# Altium PCB Thunderscope_Rev5.3.PcbDoc (part 1 of 14)
Units mil, origin at the board's own origin, x right, y up, seen from the top; angles counter-clockwise.
Board outline 3937.01 x 3838.58 mil, 6 copper layers (F.Cu, In1.Cu (GND), In2.Cu (Sign), In3.Cu (Sign), In4.Cu (GND), B.Cu), stack 60.556 mil thick; 911 components, 486 nets, 2834 pads, 2761 vias.
Unrouted connection lines stored in the file: 618.
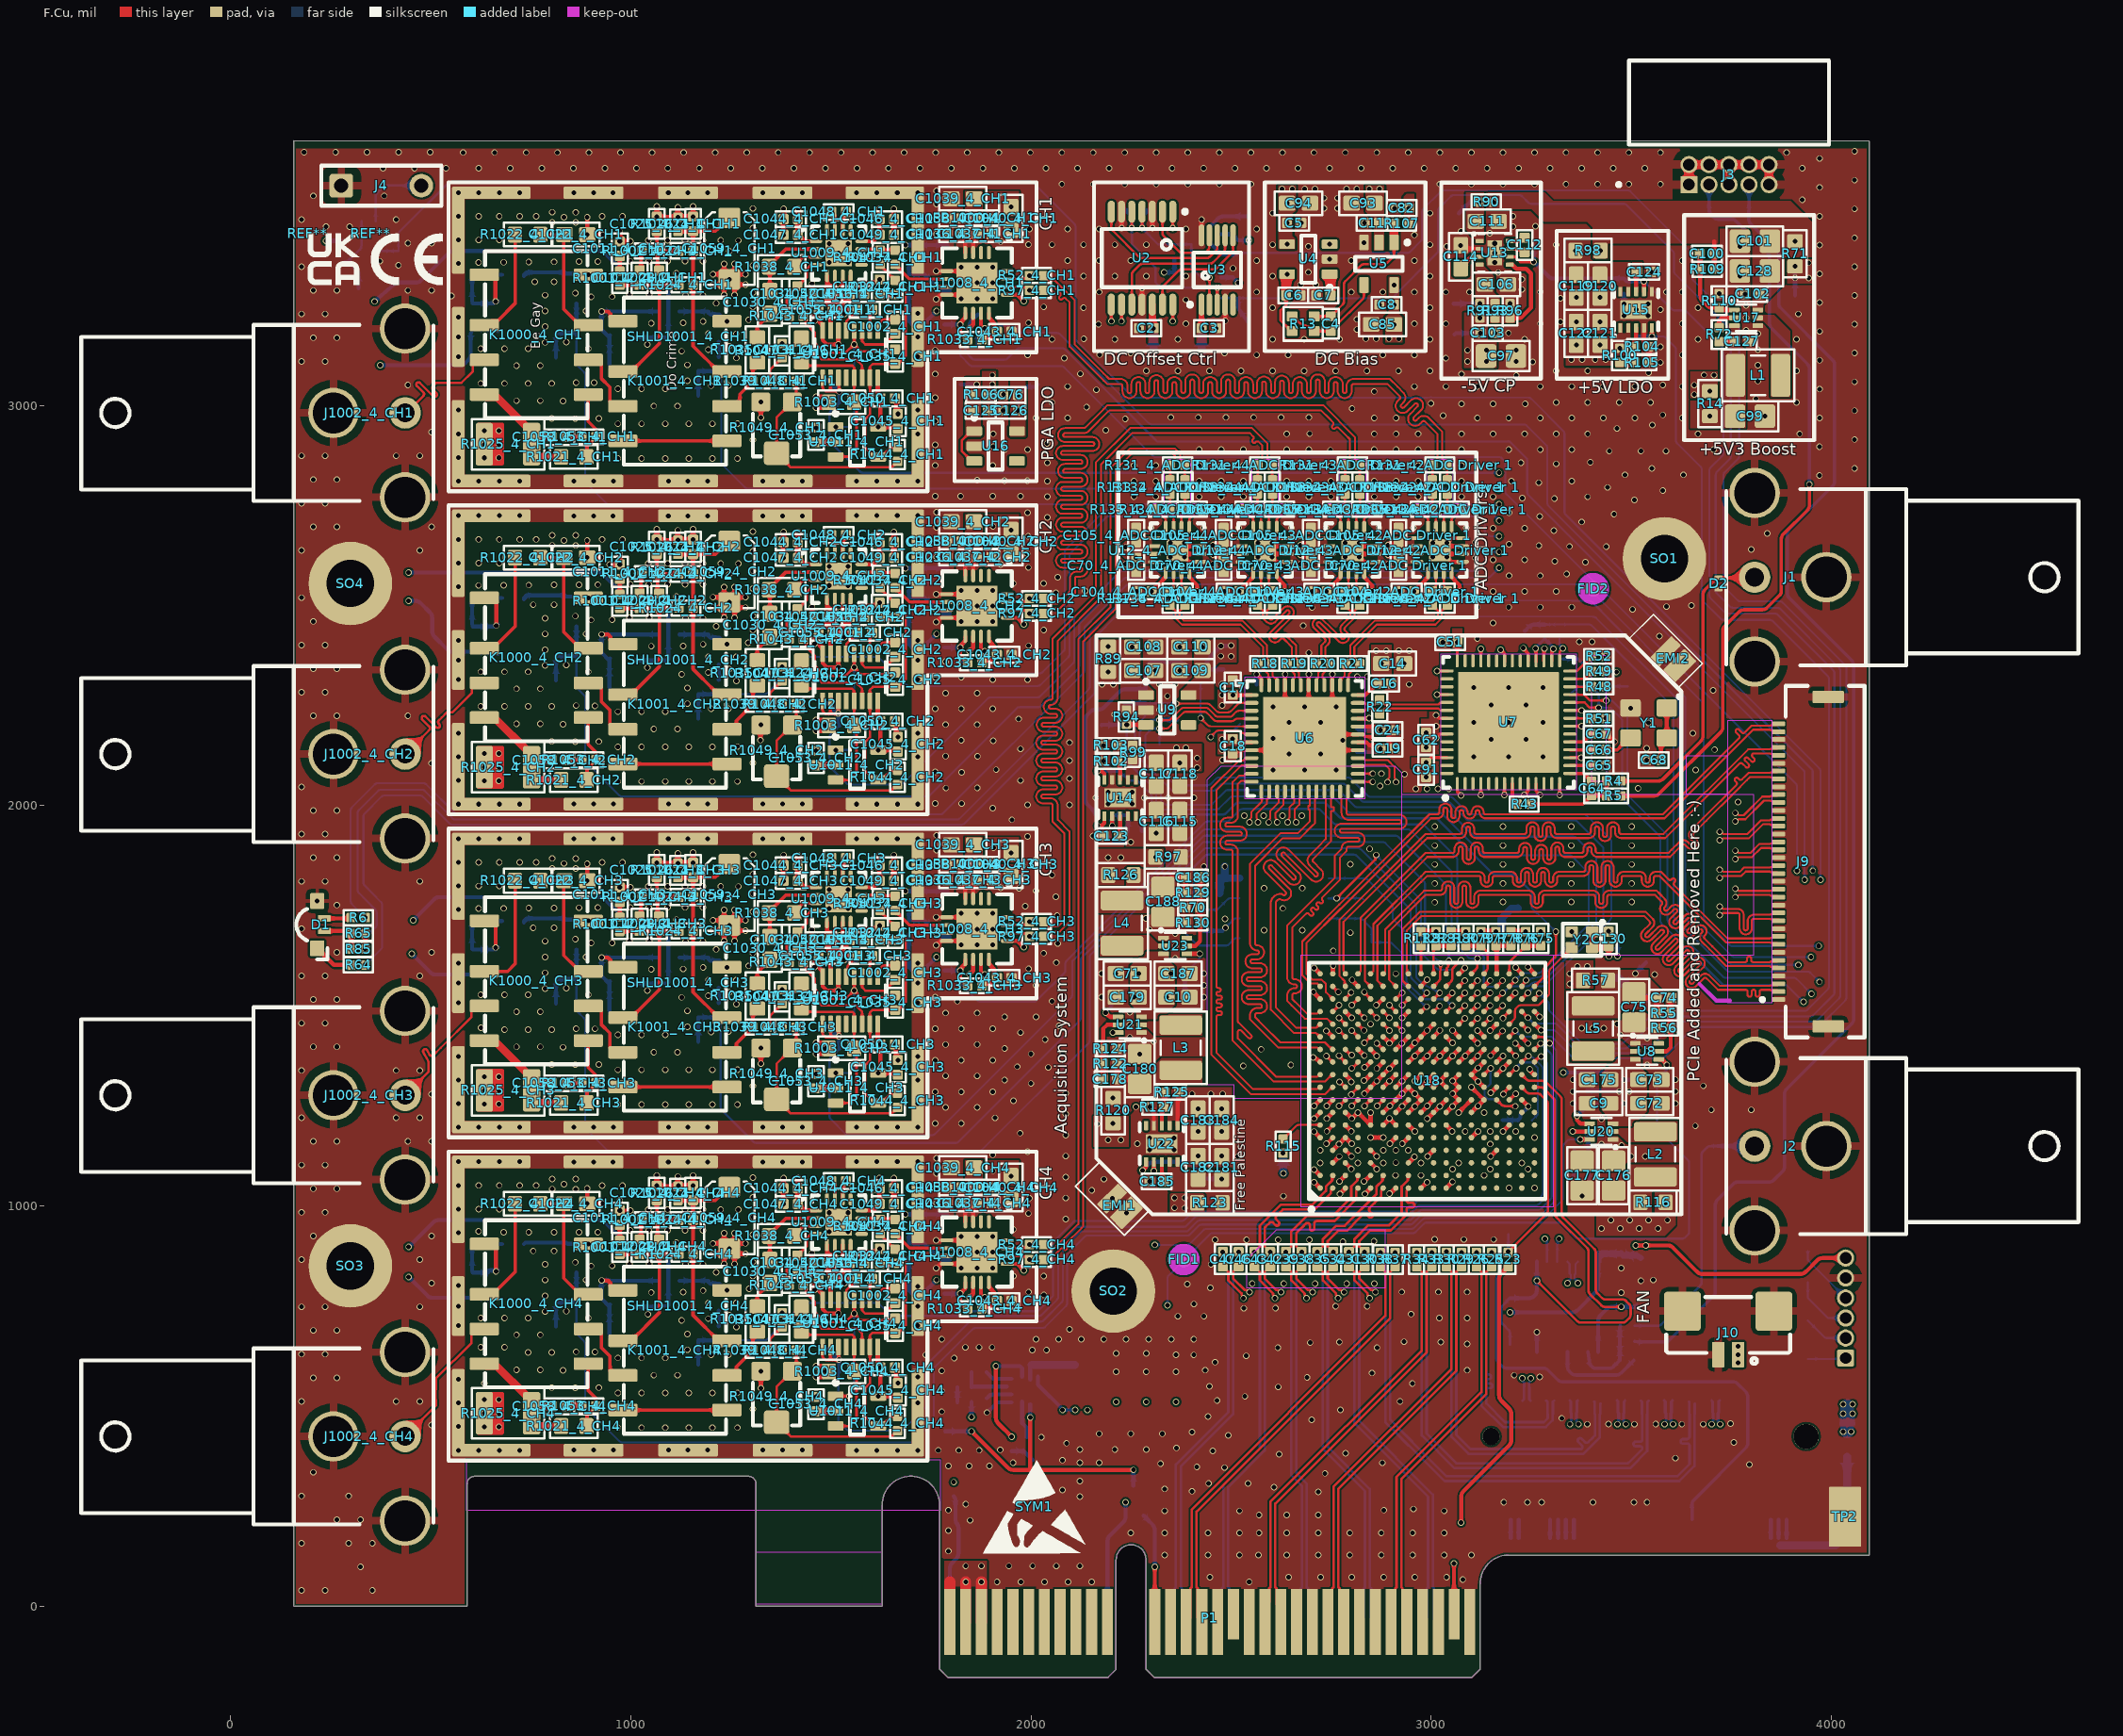
[diagram p0: F.Cu view]
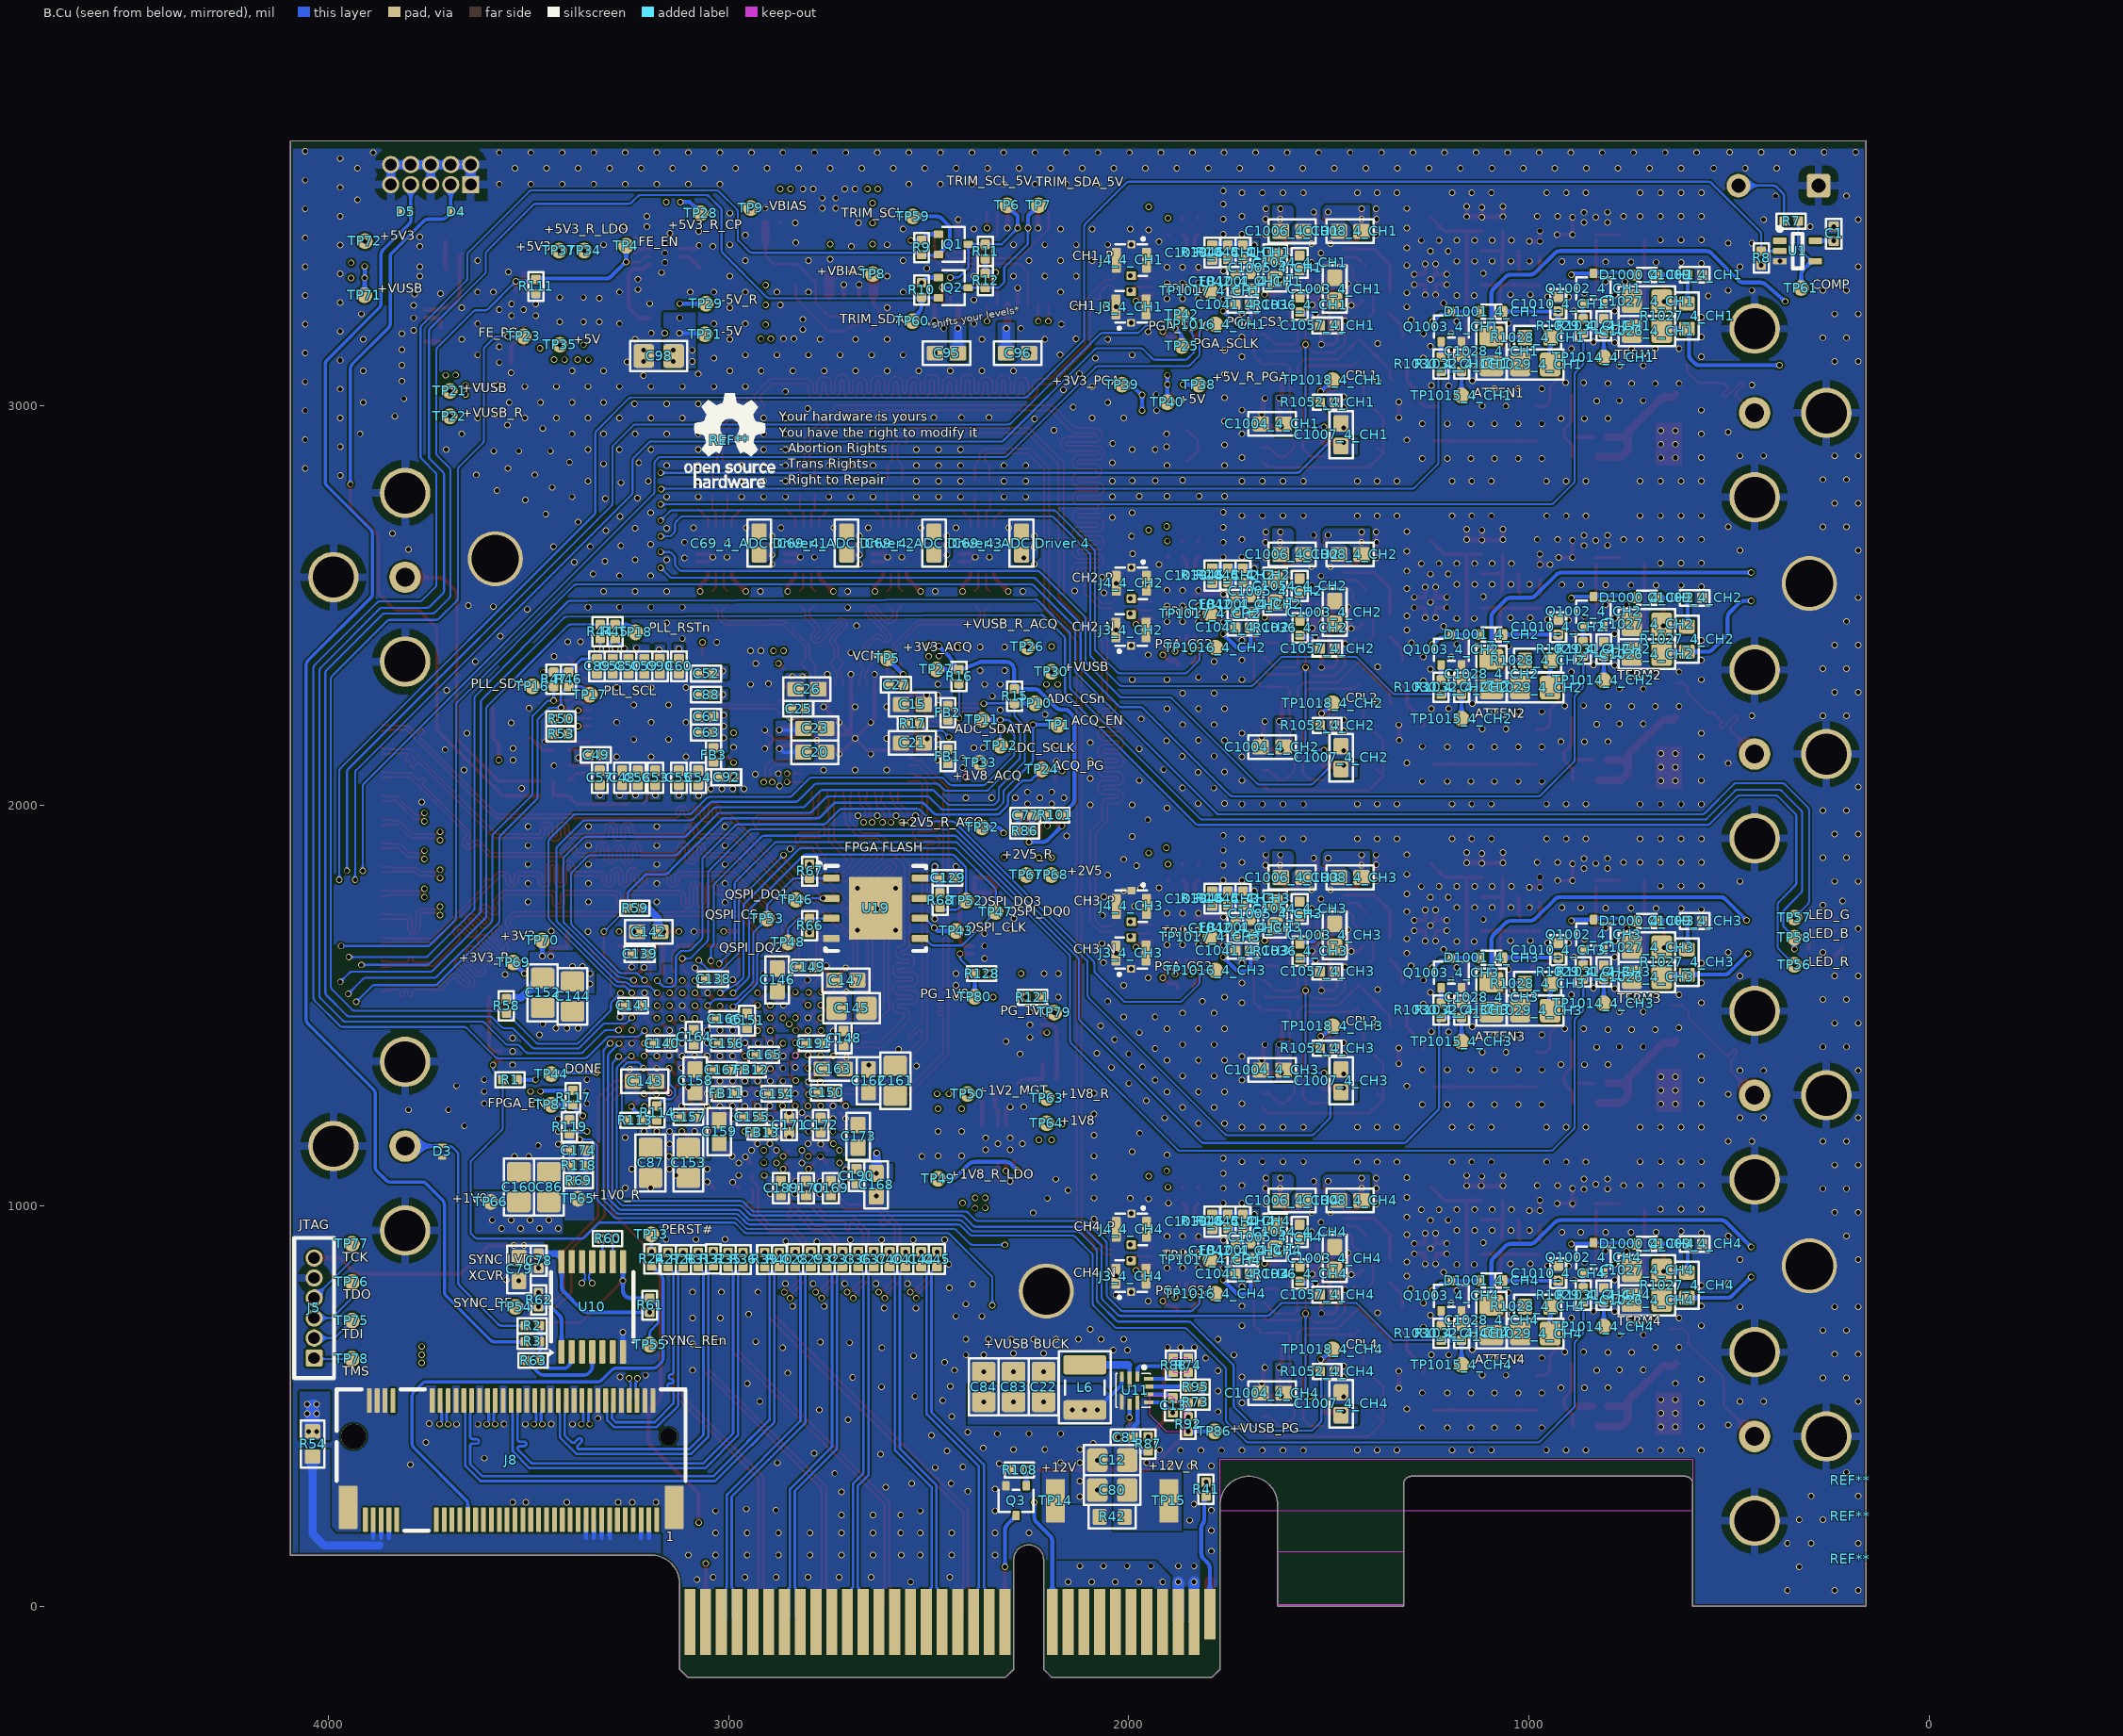
[diagram p1: B.Cu view, seen from below]
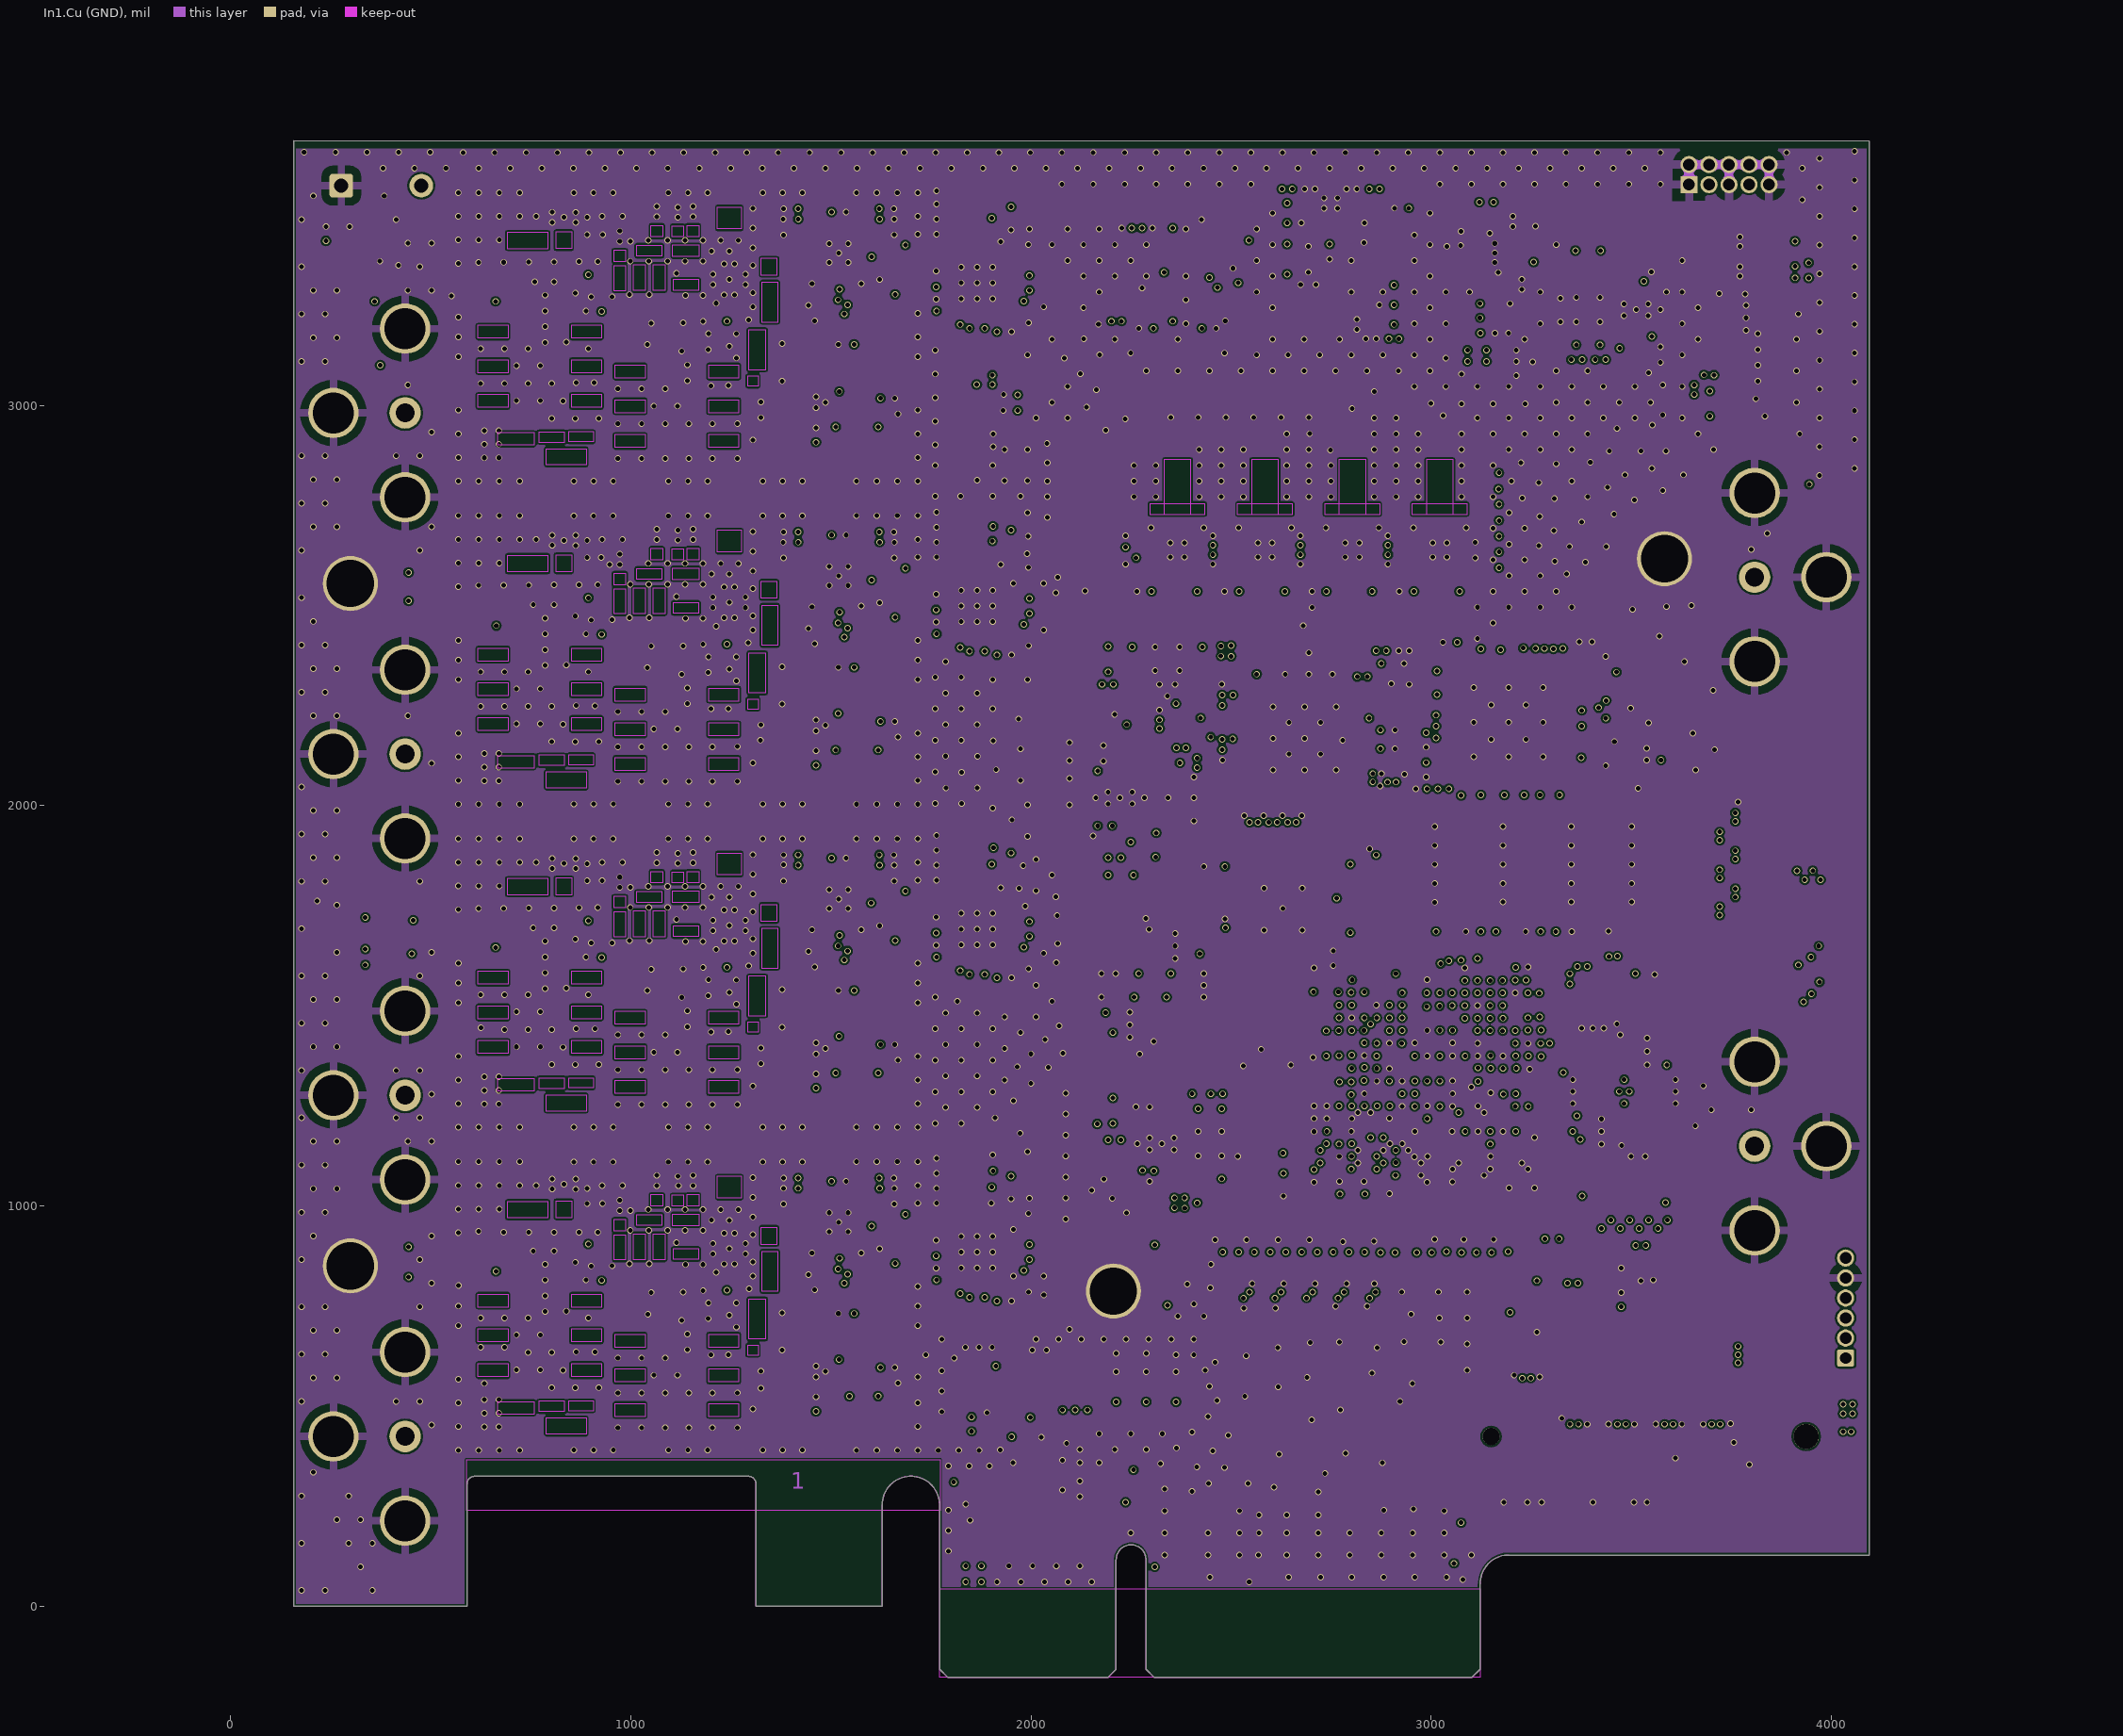
[diagram p2: In1.Cu (GND)]
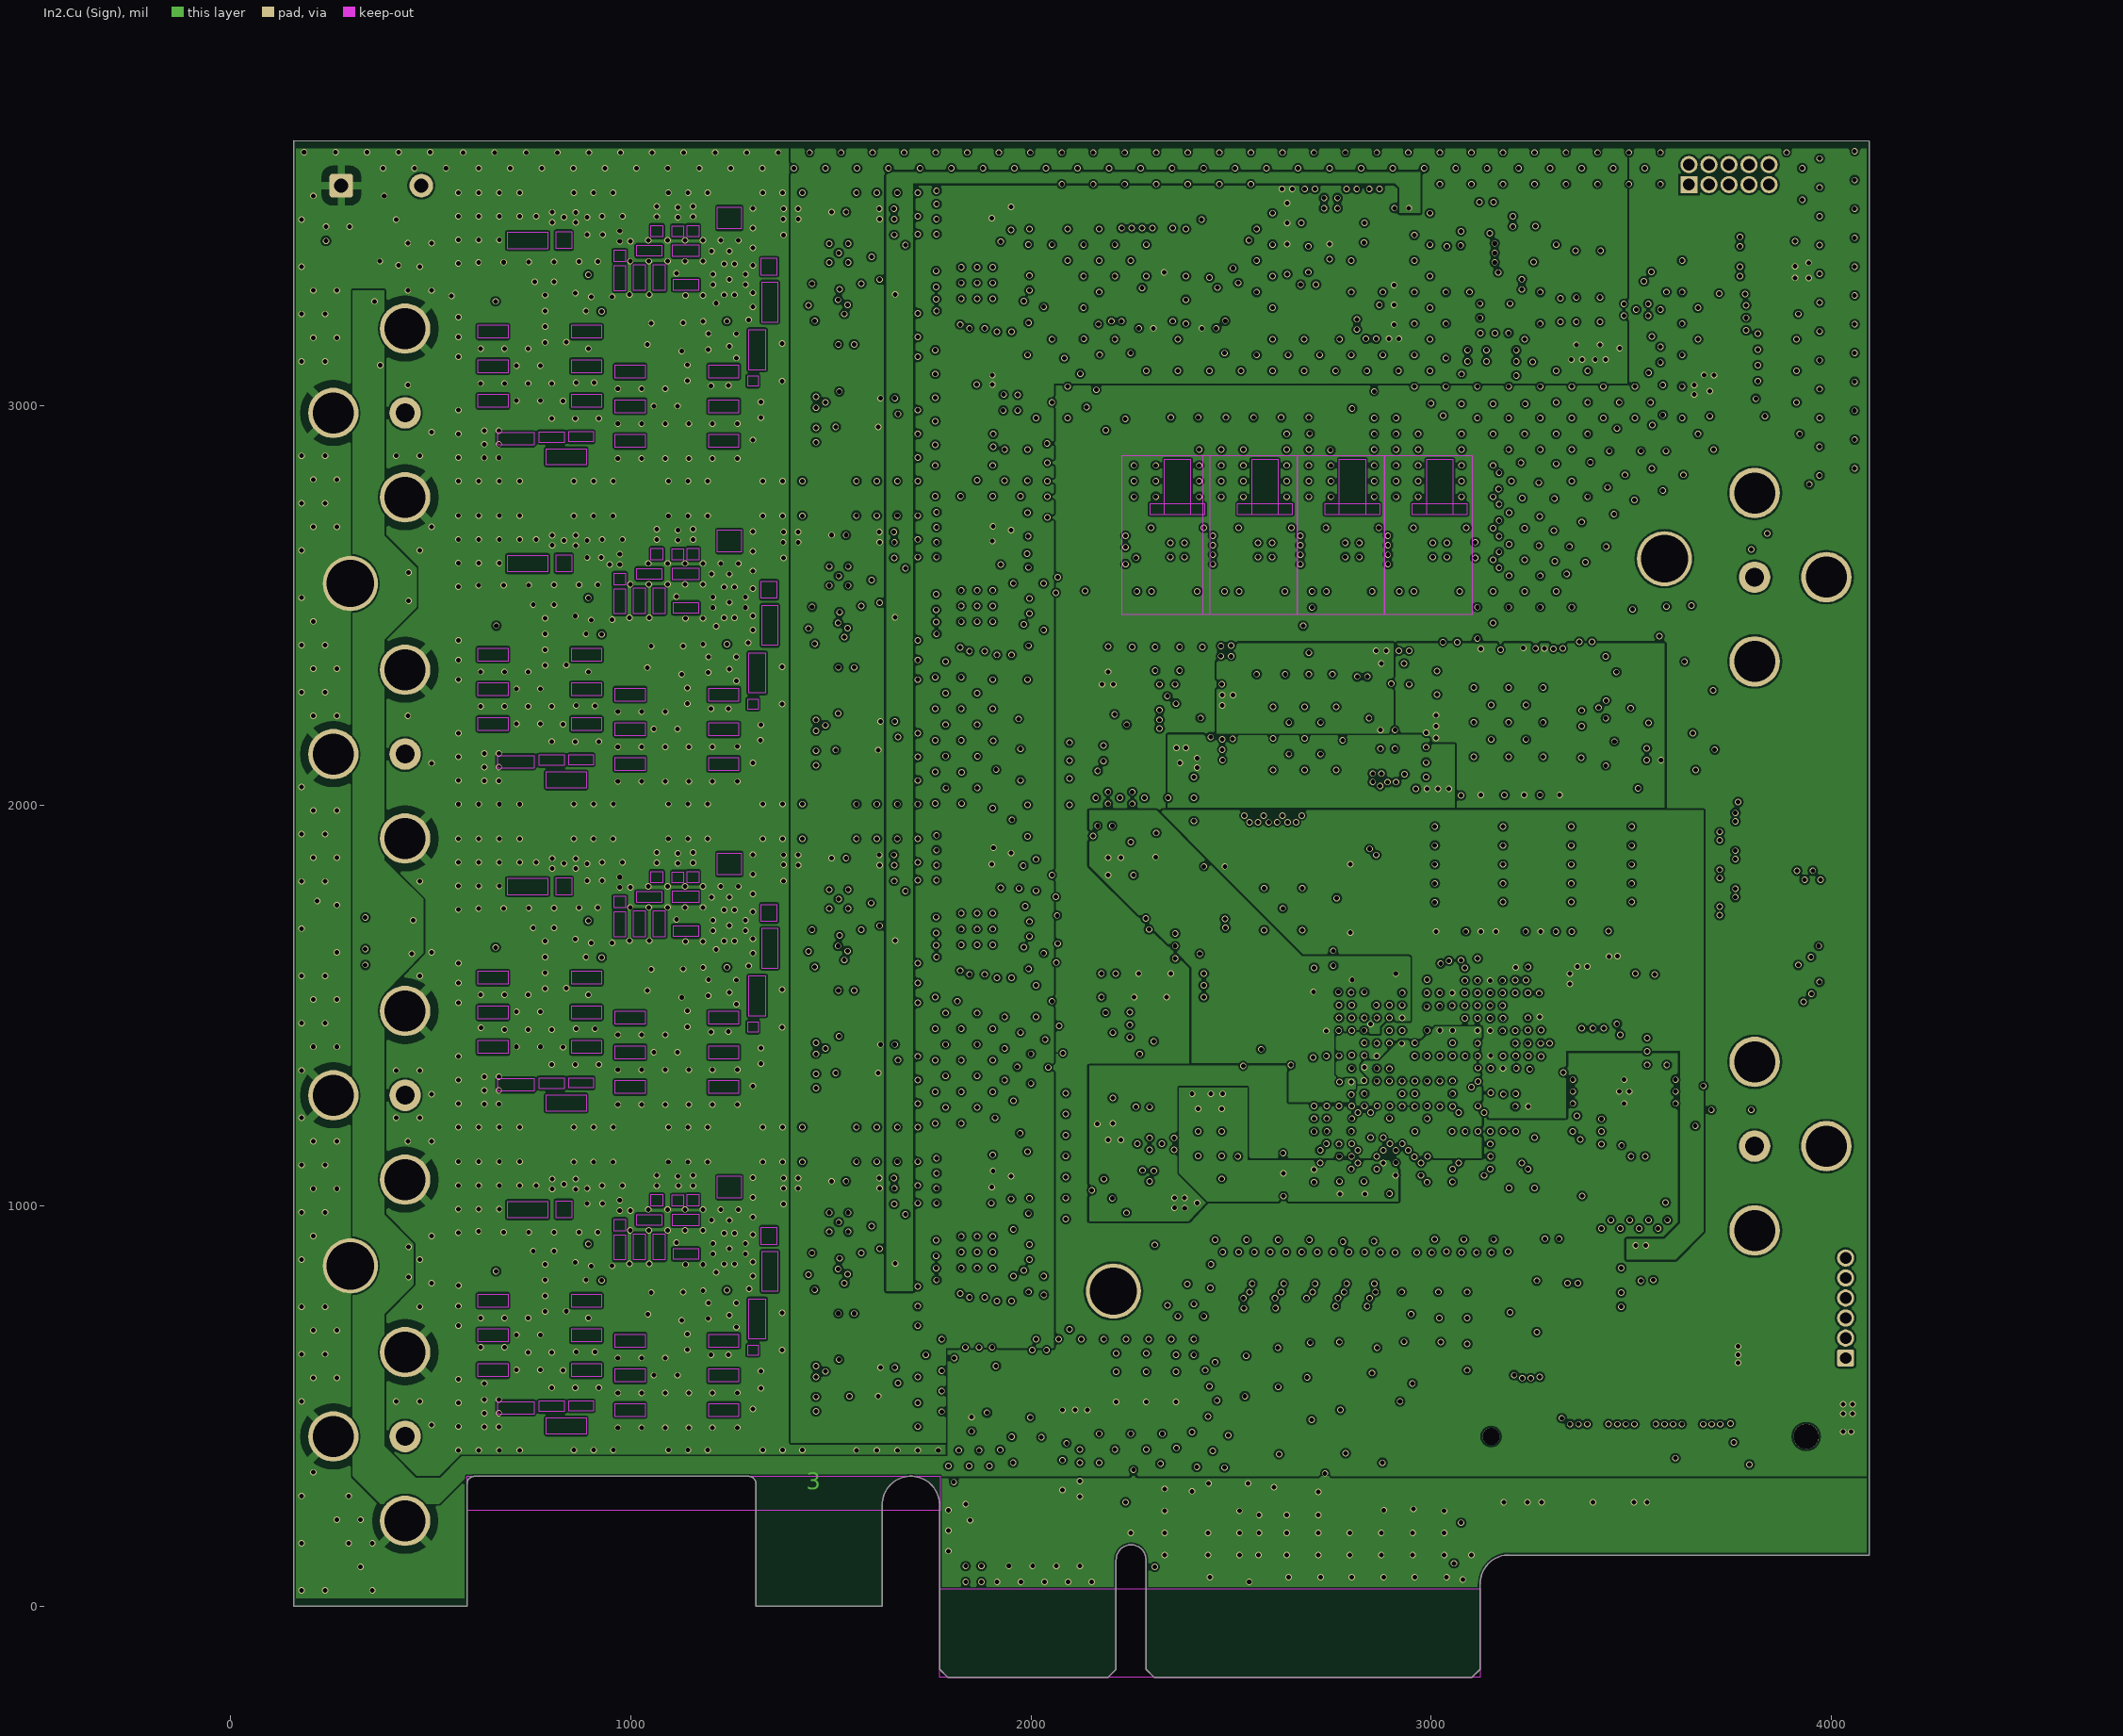
[diagram p3: In2.Cu (Sign)]
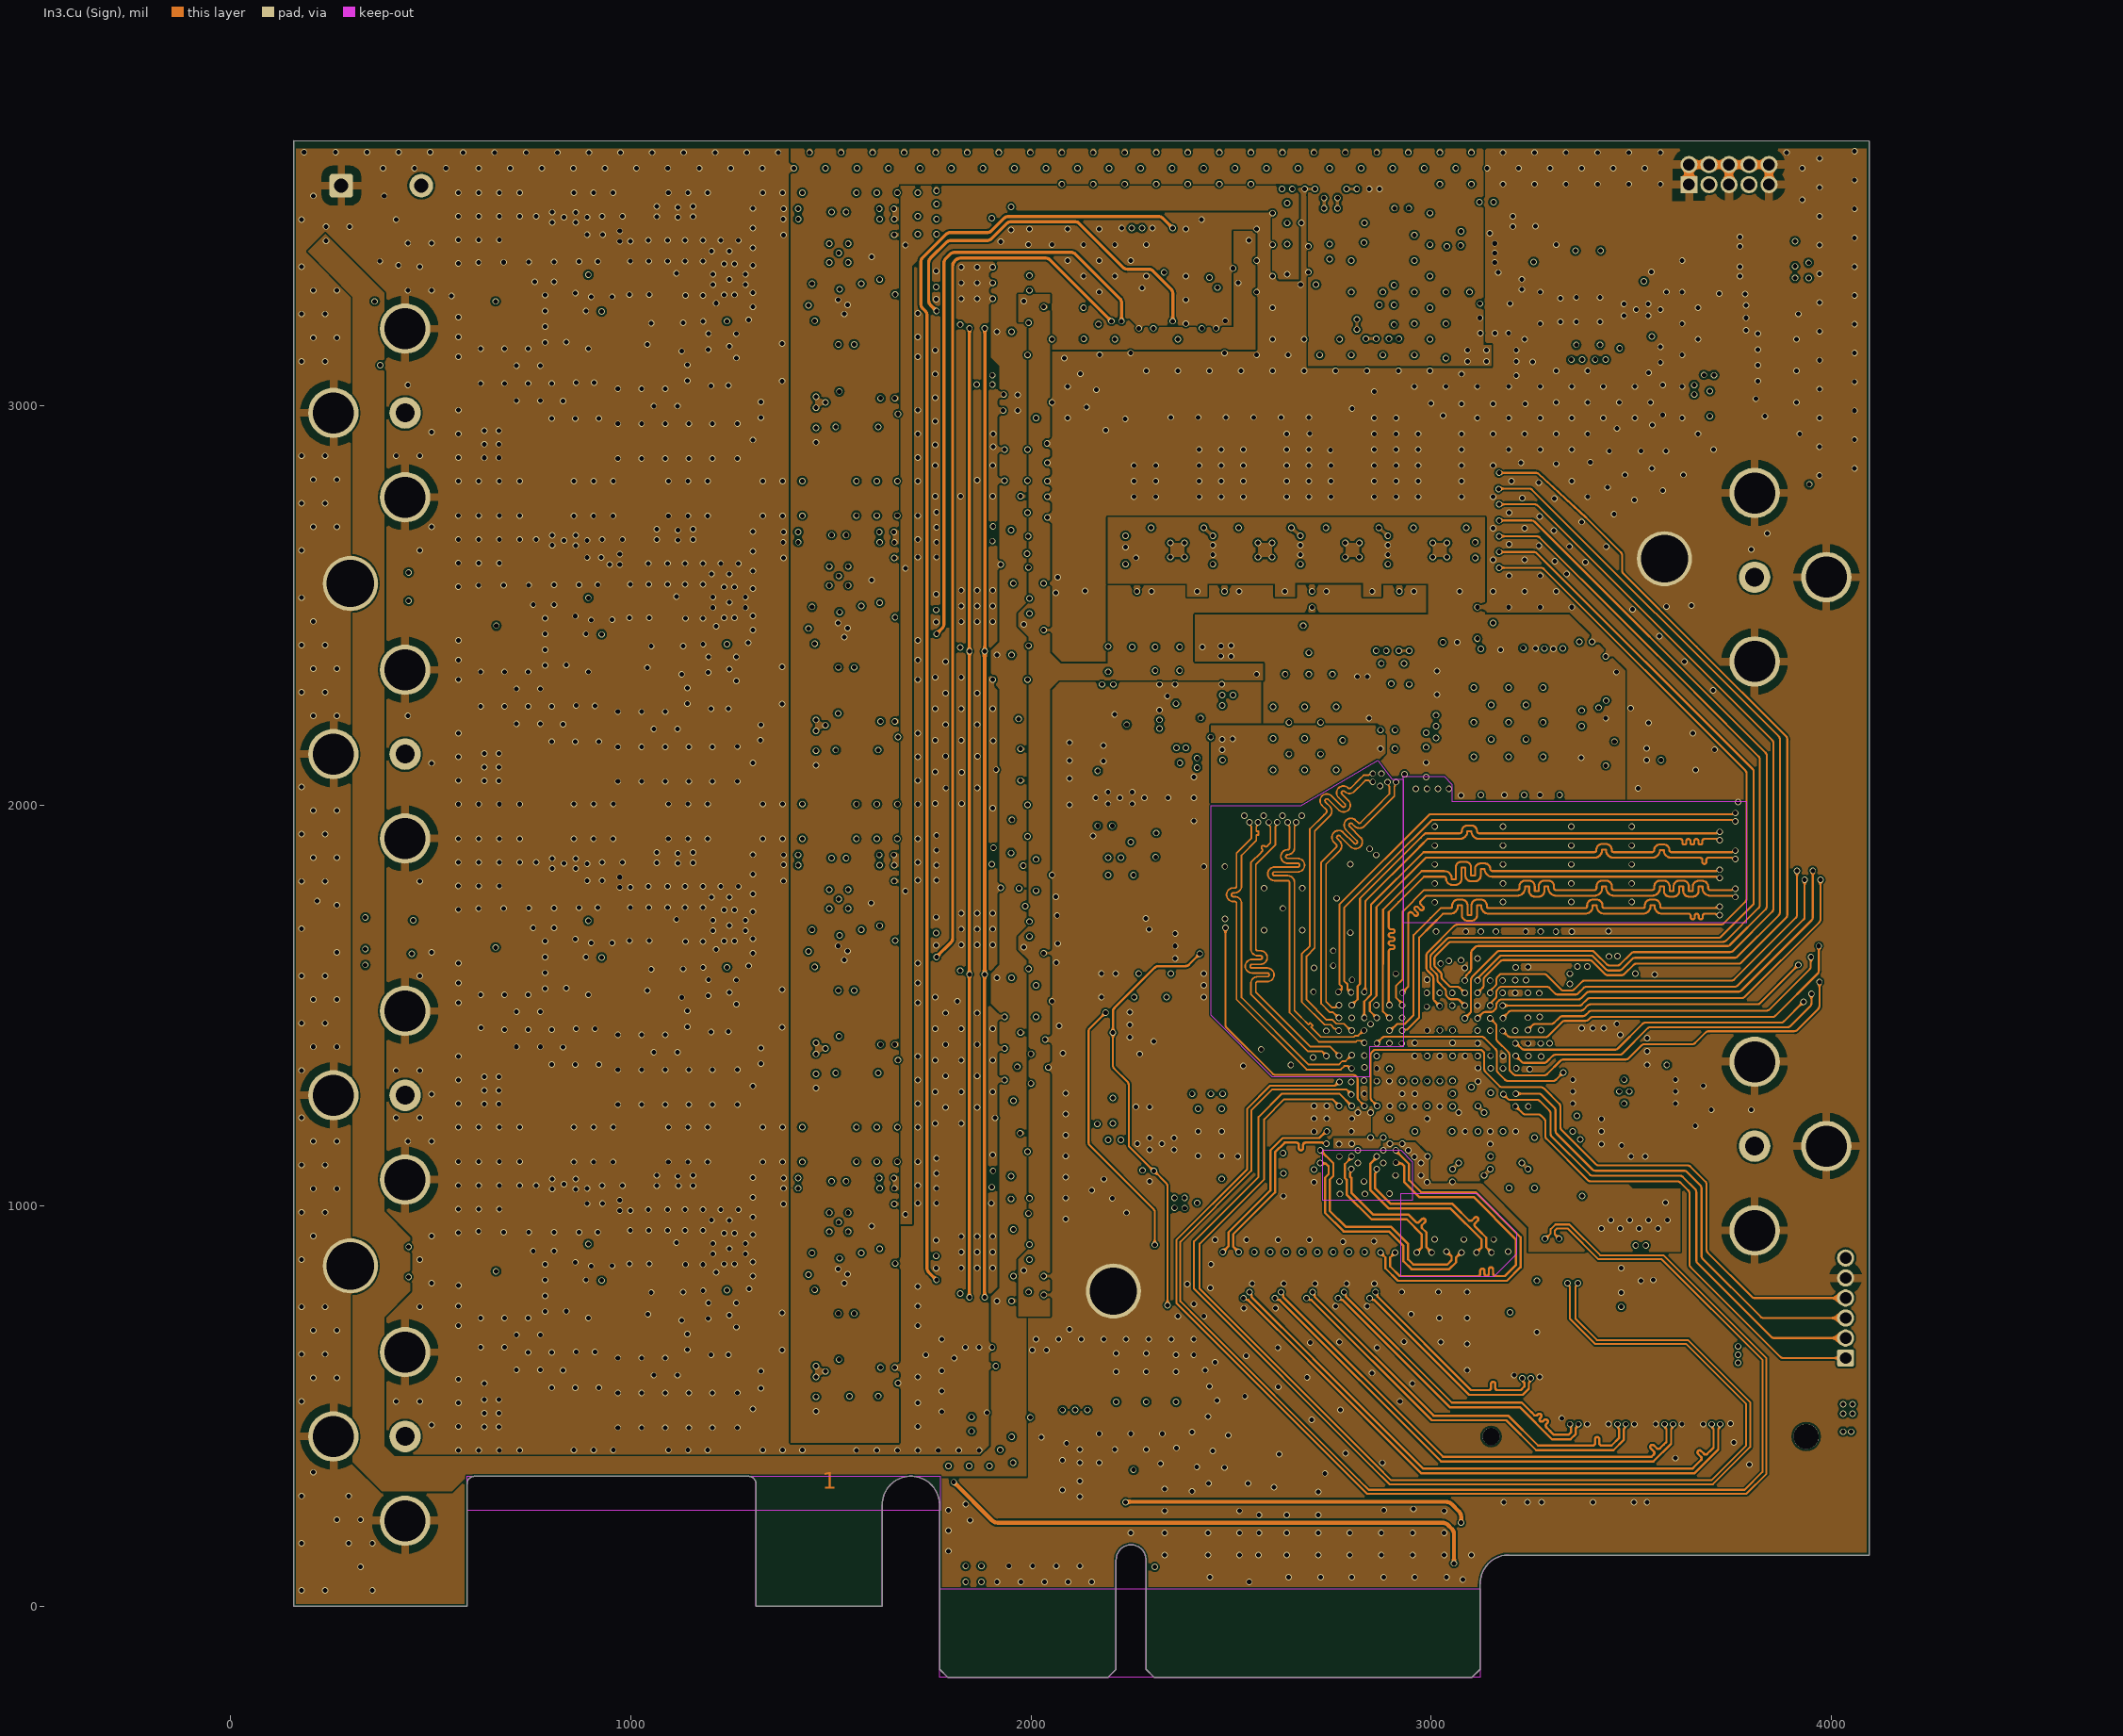
[diagram p4: In3.Cu (Sign)]
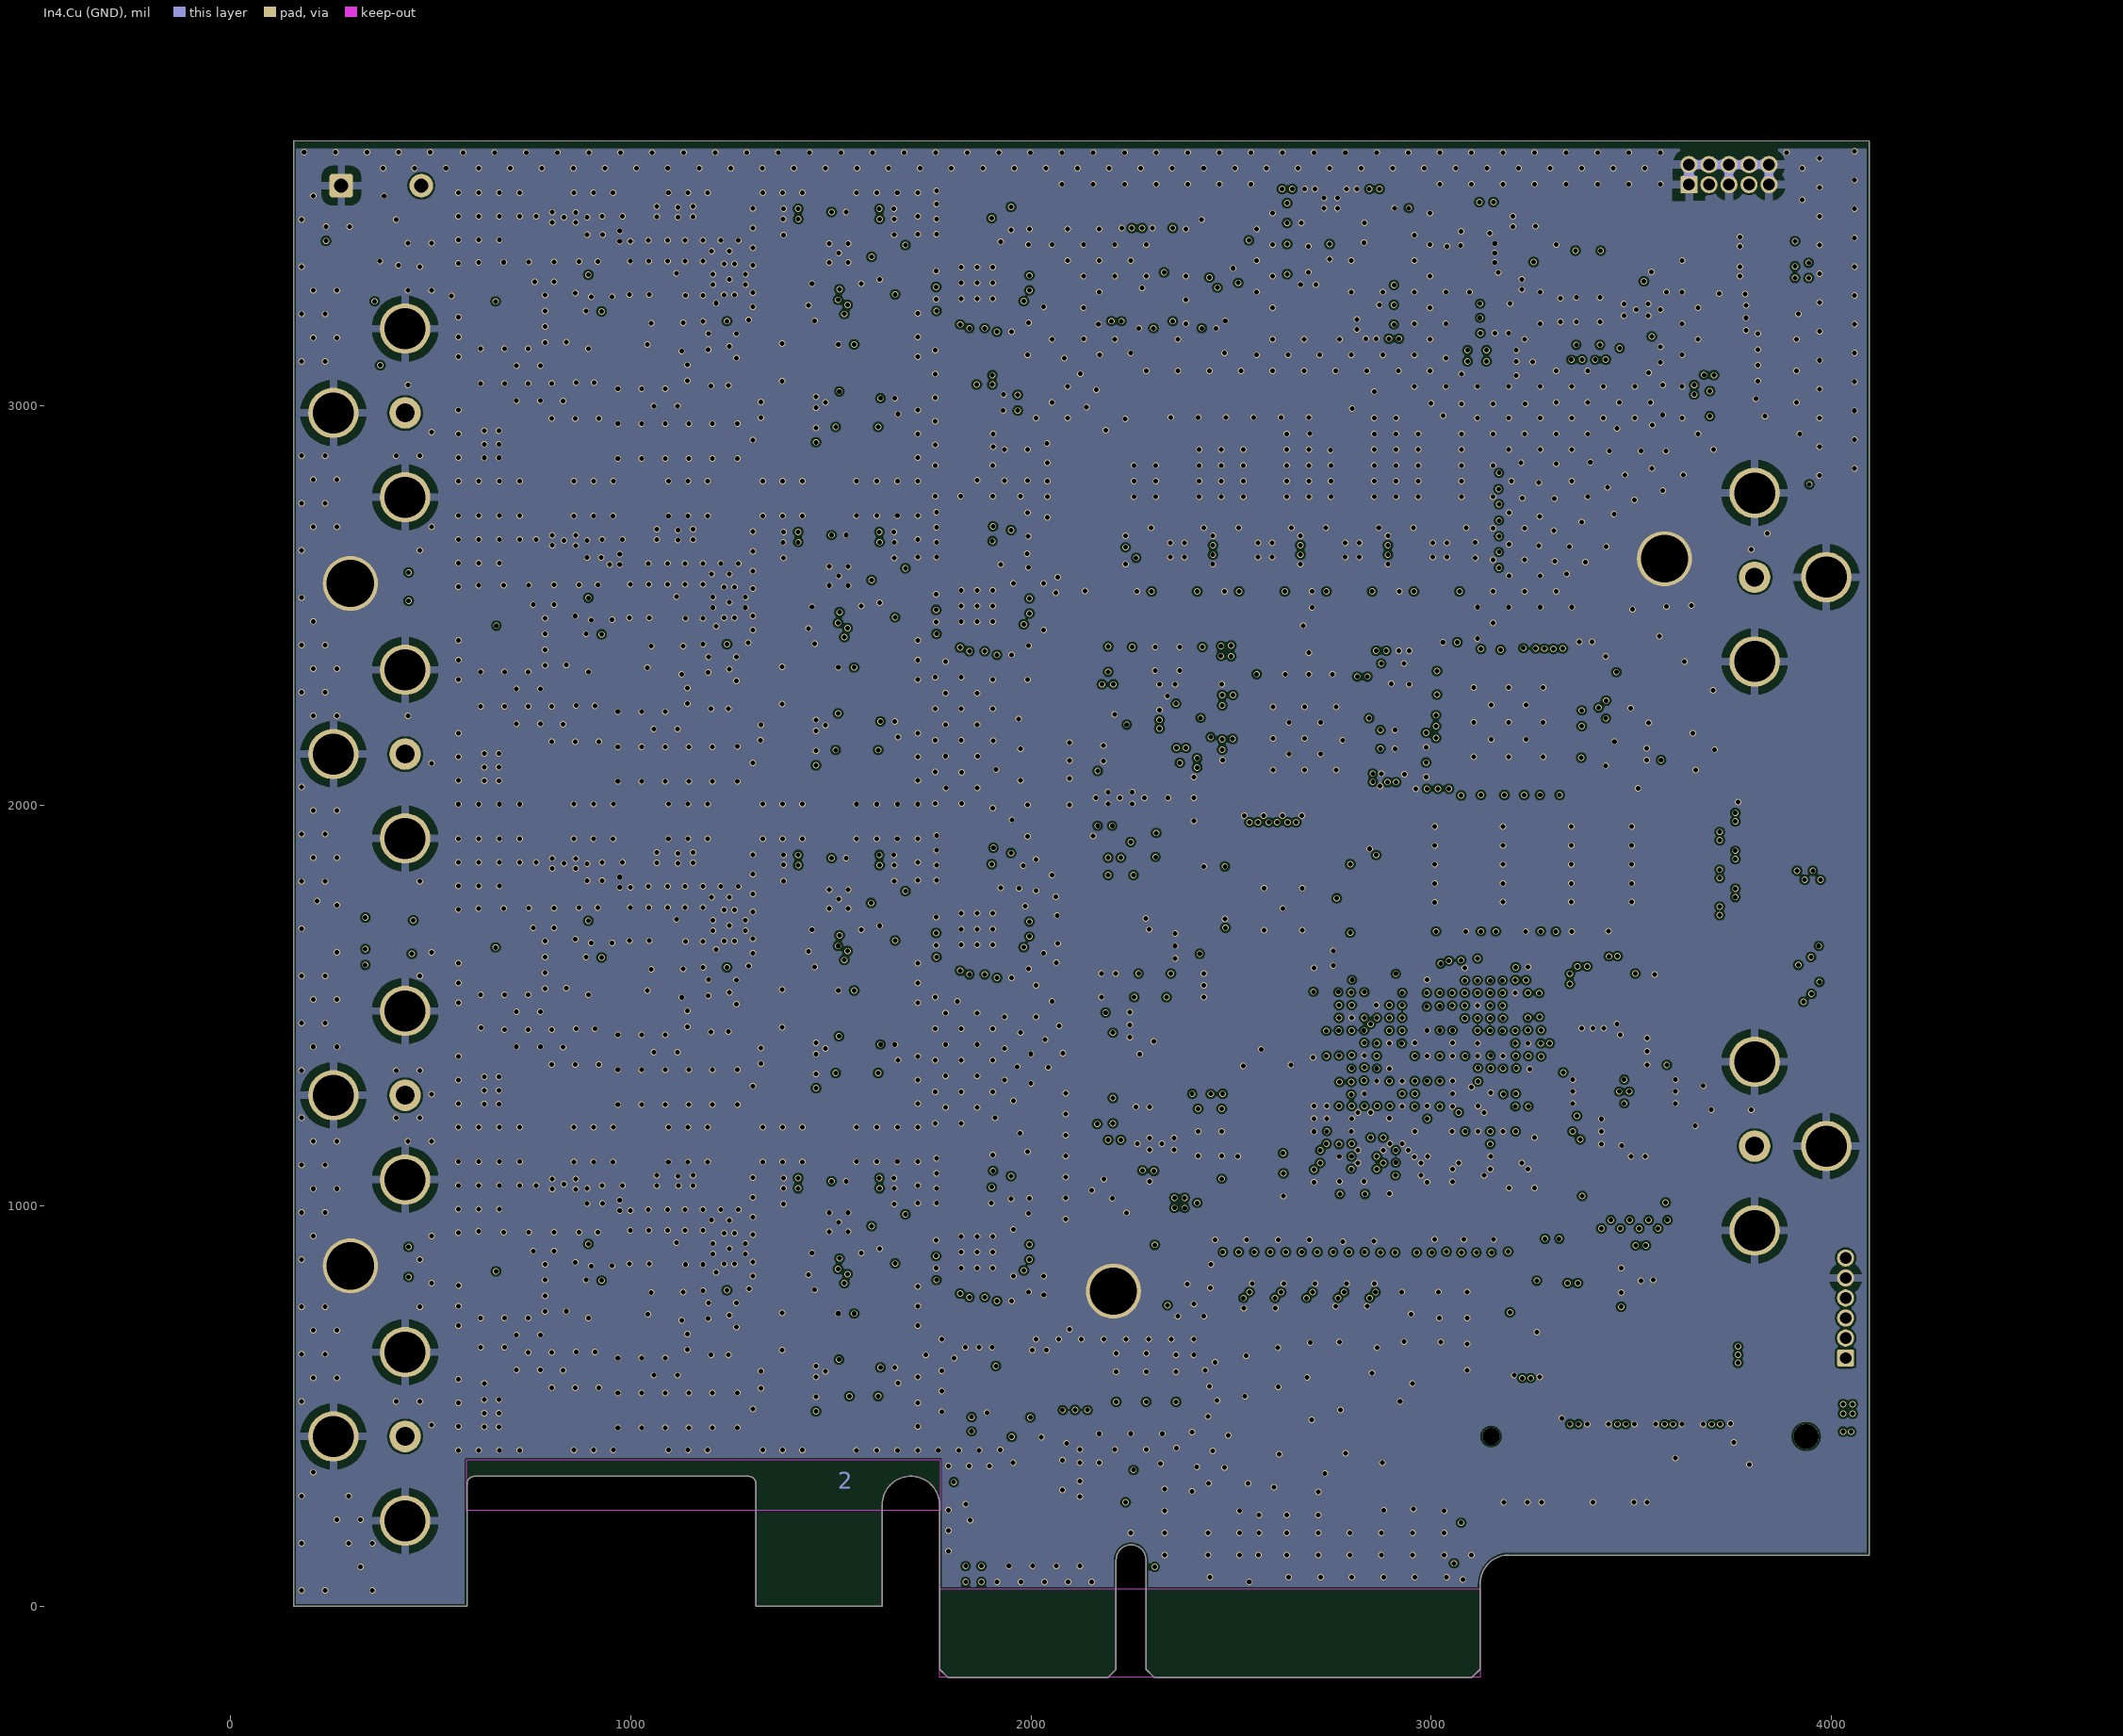
[diagram p5: In4.Cu (GND)]

## Layer stack, top to bottom
F.Mask: solder mask 1, SM-001, Dk 4
F.Cu: signal copper 1.378
Dielectric1: prepreg 3.91, PP-015, Dk 4.1
In1.Cu (GND): signal copper 0.6
Dielectric 2: core 21.65, Core-037, Dk 4.8
In2.Cu (Sign): signal copper 0.6
Dielectric3: prepreg 4.28, PP-017, Dk 4.16
In3.Cu (Sign): signal copper 0.6
Dielectric4: core 21.65, Core-037, Dk 4.8
In4.Cu (GND): signal copper 0.6
Dielectric5: prepreg 3.91, PP-015, Dk 4.1
B.Cu: signal copper 1.378
B.Mask: solder mask 1, SM-001, Dk 4

## Board outline
157.48,0 590.55,0 590.55,305.12 cw(c610.23,305.12) 610.24,324.8 1293.31,324.8 cw(c1293.31,305.12) 1312.99,305.12 1312.99,0 1627.95,0 1627.95,252.95 cw(c1699.8,252.95) 1771.65,252.95 1771.65,-157.48 1791.34,-177.17 2192.91,-177.17 2212.6,-157.48 2212.6,116.14 cw(c2250,116.14) 2287.4,116.14 2287.4,-157.48 2307.09,-177.17 3102.36,-177.17 3122.05,-157.48 3122.05,56.1 cw(c3193.9,56.1) 3193.9,127.95 4094.49,127.95 4094.49,3660.49 157.48,3661.42

## Design rules (kind name [scope] priority, off if disabled: settings)
Clearance [All] p1: gap=5 ignorepadtopadclearanceinfootprint=FALSE except(0: Region-Region Region-Text; 3.9: SMDPad-Via; 4.7: Track-SMDPad)
DiffPairsRouting DiffPairsRouting_100Z [InDifferentialPairClass('100Z_Diff')] p1: maxlimit=9.07 minlimit=5 mostfreqgap=9.07 toplayer_mingap=8 toplayer_maxgap=8 toplayer_prefgap=8 toplayer_minwidth=4.7 toplayer_maxwidth=4.7 toplayer_prefwidth=4.7 midlayer1_minwidth=15 midlayer1_maxwidth=15 midlayer1_prefwidth=15 midlayer2_mingap=9.07 midlayer2_minwidth=5 midlayer2_maxwidth=5 midlayer2_prefwidth=5 midlayer3_mingap=8 midlayer3_maxgap=8 midlayer3_prefgap=8 midlayer3_minwidth=4.3 midlayer3_maxwidth=4.3 midlayer3_prefwidth=4.3 midlayer4_minwidth=15 midlayer4_maxwidth=15 midlayer4_prefwidth=15 bottomlayer_mingap=8 bottomlayer_maxgap=8 bottomlayer_prefgap=8 bottomlayer_minwidth=4.7 bottomlayer_maxwidth=4.7 bottomlayer_prefwidth=4.7 maxuncoupledlength=500
DiffPairsRouting DiffPairsRouting_100Z_PGA [InDifferentialPairClass('100Z_Diff_PGA')] p2: maxlimit=9.07 minlimit=5 mostfreqgap=9.07 toplayer_mingap=8 toplayer_maxgap=8 toplayer_prefgap=8 toplayer_minwidth=4.7 toplayer_maxwidth=4.7 toplayer_prefwidth=4.7 midlayer1_minwidth=15 midlayer1_maxwidth=15 midlayer1_prefwidth=15 midlayer2_mingap=9.07 midlayer2_minwidth=5 midlayer2_maxwidth=5 midlayer2_prefwidth=5 midlayer3_mingap=8 midlayer3_maxgap=8 midlayer3_prefgap=8 midlayer3_minwidth=4.3 midlayer3_maxwidth=4.3 midlayer3_prefwidth=4.3 midlayer4_minwidth=15 midlayer4_maxwidth=15 midlayer4_prefwidth=15 bottomlayer_mingap=8 bottomlayer_maxgap=8 bottomlayer_prefgap=8 bottomlayer_minwidth=4.7 bottomlayer_maxwidth=4.7 bottomlayer_prefwidth=4.7 maxuncoupledlength=500
DiffPairsRouting DiffPairsRouting_USERIO [InDifferentialPairClass('USERIO')] p3: maxlimit=9.07 minlimit=5 mostfreqgap=9.07 toplayer_mingap=5.13 toplayer_maxgap=5.13 toplayer_prefgap=5.13 toplayer_minwidth=5 toplayer_maxwidth=5 toplayer_prefwidth=5 midlayer1_minwidth=15 midlayer1_maxwidth=15 midlayer1_prefwidth=15 midlayer2_mingap=9.07 midlayer2_minwidth=5 midlayer2_maxwidth=5 midlayer2_prefwidth=5 midlayer3_mingap=9.07 midlayer3_minwidth=5 midlayer3_maxwidth=5 midlayer3_prefwidth=5 midlayer4_minwidth=15 midlayer4_maxwidth=15 midlayer4_prefwidth=15 bottomlayer_mingap=5.13 bottomlayer_maxgap=5.13 bottomlayer_prefgap=5.13 bottomlayer_minwidth=5 bottomlayer_maxwidth=5 bottomlayer_prefwidth=5 maxuncoupledlength=500
DiffPairsRouting DiffPairsRouting_PCIe [InDifferentialPairClass('PCIe')] p4: maxlimit=6 minlimit=5 mostfreqgap=6 toplayer_mingap=6 toplayer_minwidth=6.2 toplayer_maxwidth=6.2 toplayer_prefwidth=6.2 midlayer1_maxgap=5 midlayer1_prefgap=5 midlayer1_minwidth=15 midlayer1_maxwidth=15 midlayer1_prefwidth=15 midlayer2_maxgap=5 midlayer2_prefgap=5 midlayer2_minwidth=5.82 midlayer2_maxwidth=5.82 midlayer2_prefwidth=5.82 midlayer3_mingap=6 midlayer3_minwidth=5.7 midlayer3_maxwidth=5.7 midlayer3_prefwidth=5.7 midlayer4_maxgap=5 midlayer4_prefgap=5 midlayer4_minwidth=15 midlayer4_maxwidth=15 midlayer4_prefwidth=15 bottomlayer_mingap=6 bottomlayer_minwidth=6.2 bottomlayer_maxwidth=6.2 bottomlayer_prefwidth=6.2 maxuncoupledlength=500
HoleSize [All] p1: absolutevalues=TRUE maxlimit=196.85 minlimit=1 maxpercent=80.000 minpercent=20.000
HoleToHoleClearance [All] p1: gap=7.87 allowstackedmicrovias=TRUE
MatchedLengths MatchedLengths_Inputs [InNetClass('50Z')] p1: tolerance=1000 checknetsindiffpair=FALSE checkdiffpairvsdiffpair=TRUE checkxsignals=TRUE checkothers=TRUE usedelayunits=TRUE delaytolerance=0.100000
MatchedLengths MatchedLengths_ADC [InDifferentialPairClass('100Z_Diff')] p2: tolerance=118.11 checknetsindiffpair=FALSE checkdiffpairvsdiffpair=TRUE checkxsignals=TRUE checkothers=TRUE usedelayunits=TRUE delaytolerance=5.000000
MatchedLengths MatchedLengths_ADC_pair [InDifferentialPairClass('100Z_Diff')] p3: tolerance=118.11 checknetsindiffpair=TRUE checkdiffpairvsdiffpair=FALSE checkxsignals=FALSE checkothers=FALSE usedelayunits=TRUE delaytolerance=2.000000
MatchedLengths MatchedLengths_PGA [InDifferentialPairClass('100Z_Diff_PGA')] p4: tolerance=118.11 checknetsindiffpair=FALSE checkdiffpairvsdiffpair=TRUE checkxsignals=TRUE checkothers=TRUE usedelayunits=TRUE delaytolerance=5.000000
MatchedLengths MatchedLengths_USERIO [InDifferentialPairClass('USERIO')] p5: tolerance=118.11 checknetsindiffpair=FALSE checkdiffpairvsdiffpair=TRUE checkxsignals=TRUE checkothers=TRUE usedelayunits=TRUE delaytolerance=5.000000
MatchedLengths MatchedLengths_PGA_pair [InDifferentialPairClass('100Z_Diff_PGA')] p6: tolerance=118.11 checknetsindiffpair=TRUE checkdiffpairvsdiffpair=FALSE checkxsignals=FALSE checkothers=FALSE usedelayunits=TRUE delaytolerance=2.000000
MatchedLengths MatchedLengths_PCIe_pair [InDifferentialPairClass('PCIe')] p7: tolerance=118.11 checknetsindiffpair=TRUE checkdiffpairvsdiffpair=FALSE checkxsignals=FALSE checkothers=FALSE usedelayunits=TRUE delaytolerance=2.000000
MinimumSolderMaskSliver [All] p1: minsoldermaskwidth=0
PlaneConnect [All] p1: planeconnectstyle=Direct reliefexpansion=20 reliefentries=4 reliefconductorwidth=10 reliefairgap=10
PolygonConnect Polygon_In3.Cu--13_ConnectDirect [IsNamedPolygon('In3.Cu--13') vs IsVia or IsSMTPin] p1: connectstyle=Direct reliefconductorwidth=10 reliefentries=4 polygonreliefangle="90 Angle" airgapwidth=10
PolygonConnect Polygon_In3.Cu--13_ConnectRelief45 [IsNamedPolygon('In3.Cu--13') vs IsThruPin and (PadShape_AllLayers = 'Round')] p2: connectstyle=Relief reliefconductorwidth=19.68 reliefentries=4 polygonreliefangle="45 Angle" airgapwidth=19.68
PolygonConnect Polygon_In3.Cu--13_ConnectRelief90 [IsNamedPolygon('In3.Cu--13') vs IsThruPin and (PadShape_AllLayers <> 'Round')] p3: connectstyle=Relief reliefconductorwidth=19.68 reliefentries=4 polygonreliefangle="90 Angle" airgapwidth=19.68
PolygonConnect Polygon_In3.Cu--12_ConnectDirect [IsNamedPolygon('In3.Cu--12')] p4: connectstyle=Direct reliefconductorwidth=10 reliefentries=4 polygonreliefangle="90 Angle" airgapwidth=10
PolygonConnect Polygon_In3.Cu--11_ConnectDirect [IsNamedPolygon('In3.Cu--11') vs IsVia or IsSMTPin] p5: connectstyle=Direct reliefconductorwidth=10 reliefentries=4 polygonreliefangle="90 Angle" airgapwidth=10
PolygonConnect Polygon_In3.Cu--11_ConnectRelief45 [IsNamedPolygon('In3.Cu--11') vs IsThruPin and (PadShape_AllLayers = 'Round')] p6: connectstyle=Relief reliefconductorwidth=19.68 reliefentries=4 polygonreliefangle="45 Angle" airgapwidth=19.68
PolygonConnect Polygon_In3.Cu--11_ConnectRelief90 [IsNamedPolygon('In3.Cu--11') vs IsThruPin and (PadShape_AllLayers <> 'Round')] p7: connectstyle=Relief reliefconductorwidth=19.68 reliefentries=4 polygonreliefangle="90 Angle" airgapwidth=19.68
PolygonConnect Polygon_In3.Cu--10_ConnectDirect [IsNamedPolygon('In3.Cu--10')] p8: connectstyle=Direct reliefconductorwidth=10 reliefentries=4 polygonreliefangle="90 Angle" airgapwidth=10
PolygonConnect Polygon_In3.Cu--9_ConnectDirect [IsNamedPolygon('In3.Cu--9')] p9: connectstyle=Direct reliefconductorwidth=10 reliefentries=4 polygonreliefangle="90 Angle" airgapwidth=10
PolygonConnect Polygon_In3.Cu--8_ConnectDirect [IsNamedPolygon('In3.Cu--8') vs IsVia or IsSMTPin] p10: connectstyle=Direct reliefconductorwidth=10 reliefentries=4 polygonreliefangle="90 Angle" airgapwidth=10
PolygonConnect Polygon_In3.Cu--8_ConnectRelief45 [IsNamedPolygon('In3.Cu--8') vs IsThruPin and (PadShape_AllLayers = 'Round')] p11: connectstyle=Relief reliefconductorwidth=19.68 reliefentries=4 polygonreliefangle="45 Angle" airgapwidth=19.68
PolygonConnect Polygon_In3.Cu--8_ConnectRelief90 [IsNamedPolygon('In3.Cu--8') vs IsThruPin and (PadShape_AllLayers <> 'Round')] p12: connectstyle=Relief reliefconductorwidth=19.68 reliefentries=4 polygonreliefangle="90 Angle" airgapwidth=19.68
PolygonConnect Polygon_In3.Cu--7_ConnectDirect [IsNamedPolygon('In3.Cu--7')] p13: connectstyle=Direct reliefconductorwidth=10 reliefentries=4 polygonreliefangle="90 Angle" airgapwidth=10
PolygonConnect Polygon_In3.Cu--6_ConnectDirect [IsNamedPolygon('In3.Cu--6')] p14: connectstyle=Direct reliefconductorwidth=10 reliefentries=4 polygonreliefangle="90 Angle" airgapwidth=10
PolygonConnect Polygon_In3.Cu--5_ConnectDirect [IsNamedPolygon('In3.Cu--5')] p15: connectstyle=Direct reliefconductorwidth=10 reliefentries=4 polygonreliefangle="90 Angle" airgapwidth=10
PolygonConnect Polygon_In3.Cu--4_ConnectDirect [IsNamedPolygon('In3.Cu--4')] p16: connectstyle=Direct reliefconductorwidth=10 reliefentries=4 polygonreliefangle="90 Angle" airgapwidth=10
PolygonConnect Polygon_In3.Cu--3_ConnectDirect [IsNamedPolygon('In3.Cu--3')] p17: connectstyle=Direct reliefconductorwidth=10 reliefentries=4 polygonreliefangle="90 Angle" airgapwidth=10
PolygonConnect Polygon_In3.Cu--2_ConnectDirect [IsNamedPolygon('In3.Cu--2')] p18: connectstyle=Direct reliefconductorwidth=10 reliefentries=4 polygonreliefangle="90 Angle" airgapwidth=10
PolygonConnect Polygon_In3.Cu--1_ConnectDirect [IsNamedPolygon('In3.Cu--1')] p19: connectstyle=Direct reliefconductorwidth=10 reliefentries=4 polygonreliefangle="90 Angle" airgapwidth=10
PolygonConnect Polygon_In2.Cu--11_ConnectDirect [IsNamedPolygon('In2.Cu--11') vs IsVia or IsSMTPin] p20: connectstyle=Direct reliefconductorwidth=10 reliefentries=4 polygonreliefangle="90 Angle" airgapwidth=10
PolygonConnect Polygon_In2.Cu--11_ConnectRelief45 [IsNamedPolygon('In2.Cu--11') vs IsThruPin and (PadShape_AllLayers = 'Round')] p21: connectstyle=Relief reliefconductorwidth=19.68 reliefentries=4 polygonreliefangle="45 Angle" airgapwidth=19.68
PolygonConnect Polygon_In2.Cu--11_ConnectRelief90 [IsNamedPolygon('In2.Cu--11') vs IsThruPin and (PadShape_AllLayers <> 'Round')] p22: connectstyle=Relief reliefconductorwidth=19.68 reliefentries=4 polygonreliefangle="90 Angle" airgapwidth=19.68
PolygonConnect Polygon_In2.Cu--10_ConnectDirect [IsNamedPolygon('In2.Cu--10')] p23: connectstyle=Direct reliefconductorwidth=10 reliefentries=4 polygonreliefangle="90 Angle" airgapwidth=10
PolygonConnect Polygon_In2.Cu--9_ConnectDirect [IsNamedPolygon('In2.Cu--9')] p24: connectstyle=Direct reliefconductorwidth=10 reliefentries=4 polygonreliefangle="90 Angle" airgapwidth=10
PolygonConnect Polygon_In2.Cu--8_ConnectDirect [IsNamedPolygon('In2.Cu--8') vs IsVia or IsSMTPin] p25: connectstyle=Direct reliefconductorwidth=10 reliefentries=4 polygonreliefangle="90 Angle" airgapwidth=10
PolygonConnect Polygon_In2.Cu--8_ConnectRelief45 [IsNamedPolygon('In2.Cu--8') vs IsThruPin and (PadShape_AllLayers = 'Round')] p26: connectstyle=Relief reliefconductorwidth=19.68 reliefentries=4 polygonreliefangle="45 Angle" airgapwidth=19.68
PolygonConnect Polygon_In2.Cu--8_ConnectRelief90 [IsNamedPolygon('In2.Cu--8') vs IsThruPin and (PadShape_AllLayers <> 'Round')] p27: connectstyle=Relief reliefconductorwidth=19.68 reliefentries=4 polygonreliefangle="90 Angle" airgapwidth=19.68
PolygonConnect Polygon_In2.Cu--7_ConnectDirect [IsNamedPolygon('In2.Cu--7')] p28: connectstyle=Direct reliefconductorwidth=10 reliefentries=4 polygonreliefangle="90 Angle" airgapwidth=10
PolygonConnect Polygon_In2.Cu--6_ConnectDirect [IsNamedPolygon('In2.Cu--6')] p29: connectstyle=Direct reliefconductorwidth=10 reliefentries=4 polygonreliefangle="90 Angle" airgapwidth=10
PolygonConnect Polygon_In2.Cu--5_ConnectDirect [IsNamedPolygon('In2.Cu--5')] p30: connectstyle=Direct reliefconductorwidth=10 reliefentries=4 polygonreliefangle="90 Angle" airgapwidth=10
PolygonConnect Polygon_In2.Cu--4_ConnectDirect [IsNamedPolygon('In2.Cu--4')] p31: connectstyle=Direct reliefconductorwidth=10 reliefentries=4 polygonreliefangle="90 Angle" airgapwidth=10
PolygonConnect Polygon_In2.Cu--3_ConnectDirect [IsNamedPolygon('In2.Cu--3')] p32: connectstyle=Direct reliefconductorwidth=10 reliefentries=4 polygonreliefangle="90 Angle" airgapwidth=10
PolygonConnect Polygon_In2.Cu--2_ConnectDirect [IsNamedPolygon('In2.Cu--2')] p33: connectstyle=Direct reliefconductorwidth=10 reliefentries=4 polygonreliefangle="90 Angle" airgapwidth=10
PolygonConnect Polygon_In2.Cu--1_ConnectDirect [IsNamedPolygon('In2.Cu--1')] p34: connectstyle=Direct reliefconductorwidth=10 reliefentries=4 polygonreliefangle="90 Angle" airgapwidth=10
PolygonConnect Polygon_In2.Cu-_ConnectDirect [IsNamedPolygon('In2.Cu-') vs IsVia or IsSMTPin] p35: connectstyle=Direct reliefconductorwidth=10 reliefentries=4 polygonreliefangle="90 Angle" airgapwidth=10
PolygonConnect Polygon_In2.Cu-_ConnectRelief45 [IsNamedPolygon('In2.Cu-') vs IsThruPin and (PadShape_AllLayers = 'Round')] p36: connectstyle=Relief reliefconductorwidth=19.68 reliefentries=4 polygonreliefangle="45 Angle" airgapwidth=19.68
PolygonConnect Polygon_In2.Cu-_ConnectRelief90 [IsNamedPolygon('In2.Cu-') vs IsThruPin and (PadShape_AllLayers <> 'Round')] p37: connectstyle=Relief reliefconductorwidth=19.68 reliefentries=4 polygonreliefangle="90 Angle" airgapwidth=19.68
PolygonConnect Polygon_B.Cu--99_ConnectDirect [IsNamedPolygon('B.Cu--99')] p38: connectstyle=Direct reliefconductorwidth=10 reliefentries=4 polygonreliefangle="90 Angle" airgapwidth=10
PolygonConnect Polygon_B.Cu--98_ConnectDirect [IsNamedPolygon('B.Cu--98')] p39: connectstyle=Direct reliefconductorwidth=10 reliefentries=4 polygonreliefangle="90 Angle" airgapwidth=10
PolygonConnect Polygon_B.Cu--97_ConnectDirect [IsNamedPolygon('B.Cu--97')] p40: connectstyle=Direct reliefconductorwidth=10 reliefentries=4 polygonreliefangle="90 Angle" airgapwidth=10
PolygonConnect Polygon_B.Cu--96_ConnectDirect [IsNamedPolygon('B.Cu--96')] p41: connectstyle=Direct reliefconductorwidth=10 reliefentries=4 polygonreliefangle="90 Angle" airgapwidth=10
PolygonConnect Polygon_B.Cu--95_ConnectDirect [IsNamedPolygon('B.Cu--95')] p42: connectstyle=Direct reliefconductorwidth=10 reliefentries=4 polygonreliefangle="90 Angle" airgapwidth=10
PolygonConnect Polygon_B.Cu--94_ConnectDirect [IsNamedPolygon('B.Cu--94')] p43: connectstyle=Direct reliefconductorwidth=10 reliefentries=4 polygonreliefangle="90 Angle" airgapwidth=10
PolygonConnect Polygon_B.Cu--93_ConnectDirect [IsNamedPolygon('B.Cu--93')] p44: connectstyle=Direct reliefconductorwidth=10 reliefentries=4 polygonreliefangle="90 Angle" airgapwidth=10
PolygonConnect Polygon_B.Cu--92_ConnectDirect [IsNamedPolygon('B.Cu--92')] p45: connectstyle=Direct reliefconductorwidth=10 reliefentries=4 polygonreliefangle="90 Angle" airgapwidth=10
PolygonConnect Polygon_B.Cu--91_ConnectDirect [IsNamedPolygon('B.Cu--91')] p46: connectstyle=Direct reliefconductorwidth=10 reliefentries=4 polygonreliefangle="90 Angle" airgapwidth=10
PolygonConnect Polygon_B.Cu--90_ConnectDirect [IsNamedPolygon('B.Cu--90')] p47: connectstyle=Direct reliefconductorwidth=10 reliefentries=4 polygonreliefangle="90 Angle" airgapwidth=10
PolygonConnect Polygon_B.Cu--89_ConnectDirect [IsNamedPolygon('B.Cu--89')] p48: connectstyle=Direct reliefconductorwidth=10 reliefentries=4 polygonreliefangle="90 Angle" airgapwidth=10
PolygonConnect Polygon_B.Cu--88_ConnectDirect [IsNamedPolygon('B.Cu--88')] p49: connectstyle=Direct reliefconductorwidth=10 reliefentries=4 polygonreliefangle="90 Angle" airgapwidth=10
PolygonConnect Polygon_B.Cu--87_ConnectDirect [IsNamedPolygon('B.Cu--87')] p50: connectstyle=Direct reliefconductorwidth=10 reliefentries=4 polygonreliefangle="90 Angle" airgapwidth=10
PolygonConnect Polygon_B.Cu--86_ConnectDirect [IsNamedPolygon('B.Cu--86')] p51: connectstyle=Direct reliefconductorwidth=10 reliefentries=4 polygonreliefangle="90 Angle" airgapwidth=10
PolygonConnect Polygon_B.Cu--85_ConnectDirect [IsNamedPolygon('B.Cu--85')] p52: connectstyle=Direct reliefconductorwidth=10 reliefentries=4 polygonreliefangle="90 Angle" airgapwidth=10
PolygonConnect Polygon_B.Cu--84_ConnectDirect [IsNamedPolygon('B.Cu--84')] p53: connectstyle=Direct reliefconductorwidth=10 reliefentries=4 polygonreliefangle="90 Angle" airgapwidth=10
PolygonConnect Polygon_B.Cu--83_ConnectDirect [IsNamedPolygon('B.Cu--83')] p54: connectstyle=Direct reliefconductorwidth=10 reliefentries=4 polygonreliefangle="90 Angle" airgapwidth=10
PolygonConnect Polygon_B.Cu--82_ConnectDirect [IsNamedPolygon('B.Cu--82')] p55: connectstyle=Direct reliefconductorwidth=10 reliefentries=4 polygonreliefangle="90 Angle" airgapwidth=10
PolygonConnect Polygon_B.Cu--81_ConnectDirect [IsNamedPolygon('B.Cu--81')] p56: connectstyle=Direct reliefconductorwidth=10 reliefentries=4 polygonreliefangle="90 Angle" airgapwidth=10
PolygonConnect Polygon_B.Cu--80_ConnectDirect [IsNamedPolygon('B.Cu--80')] p57: connectstyle=Direct reliefconductorwidth=10 reliefentries=4 polygonreliefangle="90 Angle" airgapwidth=10
PolygonConnect Polygon_B.Cu--79_ConnectDirect [IsNamedPolygon('B.Cu--79')] p58: connectstyle=Direct reliefconductorwidth=10 reliefentries=4 polygonreliefangle="90 Angle" airgapwidth=10
PolygonConnect Polygon_B.Cu--78_ConnectDirect [IsNamedPolygon('B.Cu--78')] p59: connectstyle=Direct reliefconductorwidth=10 reliefentries=4 polygonreliefangle="90 Angle" airgapwidth=10
PolygonConnect Polygon_B.Cu--77_ConnectDirect [IsNamedPolygon('B.Cu--77')] p60: connectstyle=Direct reliefconductorwidth=10 reliefentries=4 polygonreliefangle="90 Angle" airgapwidth=10
PolygonConnect Polygon_B.Cu--76_ConnectDirect [IsNamedPolygon('B.Cu--76')] p61: connectstyle=Direct reliefconductorwidth=10 reliefentries=4 polygonreliefangle="90 Angle" airgapwidth=10
PolygonConnect Polygon_B.Cu--75_ConnectDirect [IsNamedPolygon('B.Cu--75')] p62: connectstyle=Direct reliefconductorwidth=10 reliefentries=4 polygonreliefangle="90 Angle" airgapwidth=10
PolygonConnect Polygon_B.Cu--74_ConnectDirect [IsNamedPolygon('B.Cu--74')] p63: connectstyle=Direct reliefconductorwidth=10 reliefentries=4 polygonreliefangle="90 Angle" airgapwidth=10
PolygonConnect Polygon_B.Cu--73_ConnectDirect [IsNamedPolygon('B.Cu--73')] p64: connectstyle=Direct reliefconductorwidth=10 reliefentries=4 polygonreliefangle="90 Angle" airgapwidth=10
PolygonConnect Polygon_B.Cu--72_ConnectDirect [IsNamedPolygon('B.Cu--72')] p65: connectstyle=Direct reliefconductorwidth=10 reliefentries=4 polygonreliefangle="90 Angle" airgapwidth=10
PolygonConnect Polygon_B.Cu--71_ConnectDirect [IsNamedPolygon('B.Cu--71')] p66: connectstyle=Direct reliefconductorwidth=10 reliefentries=4 polygonreliefangle="90 Angle" airgapwidth=10
PolygonConnect Polygon_B.Cu--70_ConnectDirect [IsNamedPolygon('B.Cu--70')] p67: connectstyle=Direct reliefconductorwidth=10 reliefentries=4 polygonreliefangle="90 Angle" airgapwidth=10
PolygonConnect Polygon_B.Cu--69_ConnectDirect [IsNamedPolygon('B.Cu--69')] p68: connectstyle=Direct reliefconductorwidth=10 reliefentries=4 polygonreliefangle="90 Angle" airgapwidth=10
PolygonConnect Polygon_B.Cu--68_ConnectDirect [IsNamedPolygon('B.Cu--68')] p69: connectstyle=Direct reliefconductorwidth=10 reliefentries=4 polygonreliefangle="90 Angle" airgapwidth=10
PolygonConnect Polygon_B.Cu--67_ConnectDirect [IsNamedPolygon('B.Cu--67')] p70: connectstyle=Direct reliefconductorwidth=10 reliefentries=4 polygonreliefangle="90 Angle" airgapwidth=10
PolygonConnect Polygon_B.Cu--66_ConnectDirect [IsNamedPolygon('B.Cu--66')] p71: connectstyle=Direct reliefconductorwidth=10 reliefentries=4 polygonreliefangle="90 Angle" airgapwidth=10
PolygonConnect Polygon_B.Cu--65_ConnectDirect [IsNamedPolygon('B.Cu--65')] p72: connectstyle=Direct reliefconductorwidth=10 reliefentries=4 polygonreliefangle="90 Angle" airgapwidth=10
PolygonConnect Polygon_B.Cu--64_ConnectDirect [IsNamedPolygon('B.Cu--64')] p73: connectstyle=Direct reliefconductorwidth=10 reliefentries=4 polygonreliefangle="90 Angle" airgapwidth=10
PolygonConnect Polygon_B.Cu--63_ConnectDirect [IsNamedPolygon('B.Cu--63')] p74: connectstyle=Direct reliefconductorwidth=10 reliefentries=4 polygonreliefangle="90 Angle" airgapwidth=10
PolygonConnect Polygon_B.Cu--62_ConnectDirect [IsNamedPolygon('B.Cu--62')] p75: connectstyle=Direct reliefconductorwidth=10 reliefentries=4 polygonreliefangle="90 Angle" airgapwidth=10
PolygonConnect Polygon_B.Cu--61_ConnectDirect [IsNamedPolygon('B.Cu--61')] p76: connectstyle=Direct reliefconductorwidth=10 reliefentries=4 polygonreliefangle="90 Angle" airgapwidth=10
PolygonConnect Polygon_B.Cu--60_ConnectDirect [IsNamedPolygon('B.Cu--60')] p77: connectstyle=Direct reliefconductorwidth=10 reliefentries=4 polygonreliefangle="90 Angle" airgapwidth=10
PolygonConnect Polygon_B.Cu--59_ConnectDirect [IsNamedPolygon('B.Cu--59')] p78: connectstyle=Direct reliefconductorwidth=10 reliefentries=4 polygonreliefangle="90 Angle" airgapwidth=10
PolygonConnect Polygon_B.Cu--58_ConnectDirect [IsNamedPolygon('B.Cu--58')] p79: connectstyle=Direct reliefconductorwidth=10 reliefentries=4 polygonreliefangle="90 Angle" airgapwidth=10
PolygonConnect Polygon_B.Cu--57_ConnectDirect [IsNamedPolygon('B.Cu--57')] p80: connectstyle=Direct reliefconductorwidth=10 reliefentries=4 polygonreliefangle="90 Angle" airgapwidth=10
PolygonConnect Polygon_B.Cu--56_ConnectDirect [IsNamedPolygon('B.Cu--56')] p81: connectstyle=Direct reliefconductorwidth=10 reliefentries=4 polygonreliefangle="90 Angle" airgapwidth=10
PolygonConnect Polygon_B.Cu--55_ConnectDirect [IsNamedPolygon('B.Cu--55')] p82: connectstyle=Direct reliefconductorwidth=10 reliefentries=4 polygonreliefangle="90 Angle" airgapwidth=10
PolygonConnect Polygon_B.Cu--54_ConnectDirect [IsNamedPolygon('B.Cu--54')] p83: connectstyle=Direct reliefconductorwidth=10 reliefentries=4 polygonreliefangle="90 Angle" airgapwidth=10
PolygonConnect Polygon_B.Cu--53_ConnectDirect [IsNamedPolygon('B.Cu--53')] p84: connectstyle=Direct reliefconductorwidth=10 reliefentries=4 polygonreliefangle="90 Angle" airgapwidth=10
PolygonConnect Polygon_B.Cu--52_ConnectDirect [IsNamedPolygon('B.Cu--52')] p85: connectstyle=Direct reliefconductorwidth=10 reliefentries=4 polygonreliefangle="90 Angle" airgapwidth=10
PolygonConnect Polygon_B.Cu--51_ConnectDirect [IsNamedPolygon('B.Cu--51')] p86: connectstyle=Direct reliefconductorwidth=10 reliefentries=4 polygonreliefangle="90 Angle" airgapwidth=10
PolygonConnect Polygon_B.Cu--50_ConnectDirect [IsNamedPolygon('B.Cu--50')] p87: connectstyle=Direct reliefconductorwidth=10 reliefentries=4 polygonreliefangle="90 Angle" airgapwidth=10
PolygonConnect Polygon_B.Cu--49_ConnectDirect [IsNamedPolygon('B.Cu--49')] p88: connectstyle=Direct reliefconductorwidth=10 reliefentries=4 polygonreliefangle="90 Angle" airgapwidth=10
PolygonConnect Polygon_B.Cu--48_ConnectDirect [IsNamedPolygon('B.Cu--48')] p89: connectstyle=Direct reliefconductorwidth=10 reliefentries=4 polygonreliefangle="90 Angle" airgapwidth=10
PolygonConnect Polygon_B.Cu--47_ConnectDirect [IsNamedPolygon('B.Cu--47')] p90: connectstyle=Direct reliefconductorwidth=10 reliefentries=4 polygonreliefangle="90 Angle" airgapwidth=10
PolygonConnect Polygon_B.Cu--46_ConnectDirect [IsNamedPolygon('B.Cu--46')] p91: connectstyle=Direct reliefconductorwidth=10 reliefentries=4 polygonreliefangle="90 Angle" airgapwidth=10
PolygonConnect Polygon_B.Cu--45_ConnectDirect [IsNamedPolygon('B.Cu--45')] p92: connectstyle=Direct reliefconductorwidth=10 reliefentries=4 polygonreliefangle="90 Angle" airgapwidth=10
PolygonConnect Polygon_B.Cu--44_ConnectDirect [IsNamedPolygon('B.Cu--44')] p93: connectstyle=Direct reliefconductorwidth=10 reliefentries=4 polygonreliefangle="90 Angle" airgapwidth=10
PolygonConnect Polygon_B.Cu--43_ConnectDirect [IsNamedPolygon('B.Cu--43')] p94: connectstyle=Direct reliefconductorwidth=10 reliefentries=4 polygonreliefangle="90 Angle" airgapwidth=10
PolygonConnect Polygon_B.Cu--42_ConnectDirect [IsNamedPolygon('B.Cu--42')] p95: connectstyle=Direct reliefconductorwidth=10 reliefentries=4 polygonreliefangle="90 Angle" airgapwidth=10
PolygonConnect Polygon_B.Cu--41_ConnectDirect [IsNamedPolygon('B.Cu--41')] p96: connectstyle=Direct reliefconductorwidth=10 reliefentries=4 polygonreliefangle="90 Angle" airgapwidth=10
PolygonConnect Polygon_B.Cu--40_ConnectDirect [IsNamedPolygon('B.Cu--40')] p97: connectstyle=Direct reliefconductorwidth=10 reliefentries=4 polygonreliefangle="90 Angle" airgapwidth=10
PolygonConnect Polygon_B.Cu--39_ConnectDirect [IsNamedPolygon('B.Cu--39')] p98: connectstyle=Direct reliefconductorwidth=10 reliefentries=4 polygonreliefangle="90 Angle" airgapwidth=10
PolygonConnect Polygon_B.Cu--38_ConnectDirect [IsNamedPolygon('B.Cu--38')] p99: connectstyle=Direct reliefconductorwidth=10 reliefentries=4 polygonreliefangle="90 Angle" airgapwidth=10
PolygonConnect Polygon_B.Cu--37_ConnectDirect [IsNamedPolygon('B.Cu--37')] p100: connectstyle=Direct reliefconductorwidth=10 reliefentries=4 polygonreliefangle="90 Angle" airgapwidth=10
PolygonConnect Polygon_B.Cu--36_ConnectDirect [IsNamedPolygon('B.Cu--36')] p101: connectstyle=Direct reliefconductorwidth=10 reliefentries=4 polygonreliefangle="90 Angle" airgapwidth=10
PolygonConnect Polygon_B.Cu--35_ConnectDirect [IsNamedPolygon('B.Cu--35')] p102: connectstyle=Direct reliefconductorwidth=10 reliefentries=4 polygonreliefangle="90 Angle" airgapwidth=10
PolygonConnect Polygon_B.Cu--34_ConnectDirect [IsNamedPolygon('B.Cu--34')] p103: connectstyle=Direct reliefconductorwidth=10 reliefentries=4 polygonreliefangle="90 Angle" airgapwidth=10
PolygonConnect Polygon_B.Cu--33_ConnectDirect [IsNamedPolygon('B.Cu--33')] p104: connectstyle=Direct reliefconductorwidth=10 reliefentries=4 polygonreliefangle="90 Angle" airgapwidth=10
PolygonConnect Polygon_B.Cu--32_ConnectDirect [IsNamedPolygon('B.Cu--32')] p105: connectstyle=Direct reliefconductorwidth=10 reliefentries=4 polygonreliefangle="90 Angle" airgapwidth=10
PolygonConnect Polygon_B.Cu--31_ConnectDirect [IsNamedPolygon('B.Cu--31')] p106: connectstyle=Direct reliefconductorwidth=10 reliefentries=4 polygonreliefangle="90 Angle" airgapwidth=10
PolygonConnect Polygon_B.Cu--30_ConnectDirect [IsNamedPolygon('B.Cu--30')] p107: connectstyle=Direct reliefconductorwidth=10 reliefentries=4 polygonreliefangle="90 Angle" airgapwidth=10
PolygonConnect Polygon_B.Cu--29_ConnectDirect [IsNamedPolygon('B.Cu--29')] p108: connectstyle=Direct reliefconductorwidth=10 reliefentries=4 polygonreliefangle="90 Angle" airgapwidth=10
PolygonConnect Polygon_B.Cu--28_ConnectDirect [IsNamedPolygon('B.Cu--28')] p109: connectstyle=Direct reliefconductorwidth=10 reliefentries=4 polygonreliefangle="90 Angle" airgapwidth=10
PolygonConnect Polygon_B.Cu--27_ConnectDirect [IsNamedPolygon('B.Cu--27')] p110: connectstyle=Direct reliefconductorwidth=10 reliefentries=4 polygonreliefangle="90 Angle" airgapwidth=10
PolygonConnect Polygon_B.Cu--26_ConnectDirect [IsNamedPolygon('B.Cu--26')] p111: connectstyle=Direct reliefconductorwidth=10 reliefentries=4 polygonreliefangle="90 Angle" airgapwidth=10
PolygonConnect Polygon_B.Cu--25_ConnectDirect [IsNamedPolygon('B.Cu--25')] p112: connectstyle=Direct reliefconductorwidth=10 reliefentries=4 polygonreliefangle="90 Angle" airgapwidth=10
PolygonConnect Polygon_B.Cu--24_ConnectDirect [IsNamedPolygon('B.Cu--24')] p113: connectstyle=Direct reliefconductorwidth=10 reliefentries=4 polygonreliefangle="90 Angle" airgapwidth=10
PolygonConnect Polygon_B.Cu--23_ConnectDirect [IsNamedPolygon('B.Cu--23')] p114: connectstyle=Direct reliefconductorwidth=10 reliefentries=4 polygonreliefangle="90 Angle" airgapwidth=10
PolygonConnect Polygon_B.Cu--22_ConnectDirect [IsNamedPolygon('B.Cu--22')] p115: connectstyle=Direct reliefconductorwidth=10 reliefentries=4 polygonreliefangle="90 Angle" airgapwidth=10
PolygonConnect Polygon_B.Cu--21_ConnectDirect [IsNamedPolygon('B.Cu--21')] p116: connectstyle=Direct reliefconductorwidth=10 reliefentries=4 polygonreliefangle="90 Angle" airgapwidth=10
PolygonConnect Polygon_B.Cu--20_ConnectDirect [IsNamedPolygon('B.Cu--20')] p117: connectstyle=Direct reliefconductorwidth=10 reliefentries=4 polygonreliefangle="90 Angle" airgapwidth=10
PolygonConnect Polygon_B.Cu--19_ConnectDirect [IsNamedPolygon('B.Cu--19')] p118: connectstyle=Direct reliefconductorwidth=10 reliefentries=4 polygonreliefangle="90 Angle" airgapwidth=10
PolygonConnect Polygon_B.Cu--18_ConnectDirect [IsNamedPolygon('B.Cu--18')] p119: connectstyle=Direct reliefconductorwidth=10 reliefentries=4 polygonreliefangle="90 Angle" airgapwidth=10
PolygonConnect Polygon_B.Cu--17_ConnectDirect [IsNamedPolygon('B.Cu--17')] p120: connectstyle=Direct reliefconductorwidth=10 reliefentries=4 polygonreliefangle="90 Angle" airgapwidth=10
PolygonConnect Polygon_B.Cu--16_ConnectDirect [IsNamedPolygon('B.Cu--16')] p121: connectstyle=Direct reliefconductorwidth=10 reliefentries=4 polygonreliefangle="90 Angle" airgapwidth=10
PolygonConnect Polygon_B.Cu--15_ConnectDirect [IsNamedPolygon('B.Cu--15')] p122: connectstyle=Direct reliefconductorwidth=10 reliefentries=4 polygonreliefangle="90 Angle" airgapwidth=10
PolygonConnect Polygon_B.Cu--14_ConnectDirect [IsNamedPolygon('B.Cu--14')] p123: connectstyle=Direct reliefconductorwidth=10 reliefentries=4 polygonreliefangle="90 Angle" airgapwidth=10
PolygonConnect Polygon_B.Cu--13_ConnectDirect [IsNamedPolygon('B.Cu--13')] p124: connectstyle=Direct reliefconductorwidth=10 reliefentries=4 polygonreliefangle="90 Angle" airgapwidth=10
PolygonConnect Polygon_B.Cu--12_ConnectDirect [IsNamedPolygon('B.Cu--12')] p125: connectstyle=Direct reliefconductorwidth=10 reliefentries=4 polygonreliefangle="90 Angle" airgapwidth=10
PolygonConnect Polygon_B.Cu--11_ConnectDirect [IsNamedPolygon('B.Cu--11')] p126: connectstyle=Direct reliefconductorwidth=10 reliefentries=4 polygonreliefangle="90 Angle" airgapwidth=10
PolygonConnect Polygon_B.Cu--10_ConnectDirect [IsNamedPolygon('B.Cu--10')] p127: connectstyle=Direct reliefconductorwidth=10 reliefentries=4 polygonreliefangle="90 Angle" airgapwidth=10
PolygonConnect Polygon_B.Cu--9_ConnectDirect [IsNamedPolygon('B.Cu--9')] p128: connectstyle=Direct reliefconductorwidth=10 reliefentries=4 polygonreliefangle="90 Angle" airgapwidth=10
PolygonConnect Polygon_B.Cu--8_ConnectDirect [IsNamedPolygon('B.Cu--8')] p129: connectstyle=Direct reliefconductorwidth=10 reliefentries=4 polygonreliefangle="90 Angle" airgapwidth=10
PolygonConnect Polygon_B.Cu--7_ConnectDirect [IsNamedPolygon('B.Cu--7')] p130: connectstyle=Direct reliefconductorwidth=10 reliefentries=4 polygonreliefangle="90 Angle" airgapwidth=10
PolygonConnect Polygon_B.Cu--6_ConnectDirect [IsNamedPolygon('B.Cu--6')] p131: connectstyle=Direct reliefconductorwidth=10 reliefentries=4 polygonreliefangle="90 Angle" airgapwidth=10
PolygonConnect Polygon_B.Cu--5_ConnectDirect [IsNamedPolygon('B.Cu--5')] p132: connectstyle=Direct reliefconductorwidth=10 reliefentries=4 polygonreliefangle="90 Angle" airgapwidth=10
PolygonConnect Polygon_B.Cu--4_ConnectDirect [IsNamedPolygon('B.Cu--4')] p133: connectstyle=Direct reliefconductorwidth=10 reliefentries=4 polygonreliefangle="90 Angle" airgapwidth=10
PolygonConnect Polygon_B.Cu--3_ConnectDirect [IsNamedPolygon('B.Cu--3')] p134: connectstyle=Direct reliefconductorwidth=10 reliefentries=4 polygonreliefangle="90 Angle" airgapwidth=10
PolygonConnect Polygon_B.Cu--2_ConnectDirect [IsNamedPolygon('B.Cu--2')] p135: connectstyle=Direct reliefconductorwidth=10 reliefentries=4 polygonreliefangle="90 Angle" airgapwidth=10
PolygonConnect Polygon_B.Cu--1_ConnectDirect [IsNamedPolygon('B.Cu--1')] p136: connectstyle=Direct reliefconductorwidth=10 reliefentries=4 polygonreliefangle="90 Angle" airgapwidth=10
PolygonConnect Polygon_In4.Cu-_ConnectDirect [IsNamedPolygon('In4.Cu-') vs IsVia or IsSMTPin] p137: connectstyle=Direct reliefconductorwidth=10 reliefentries=4 polygonreliefangle="90 Angle" airgapwidth=10
PolygonConnect Polygon_In4.Cu-_ConnectRelief45 [IsNamedPolygon('In4.Cu-') vs IsThruPin and (PadShape_AllLayers = 'Round')] p138: connectstyle=Relief reliefconductorwidth=19.68 reliefentries=4 polygonreliefangle="90 Angle" airgapwidth=19.68
PolygonConnect Polygon_In4.Cu-_ConnectRelief90 [IsNamedPolygon('In4.Cu-') vs IsThruPin and (PadShape_AllLayers <> 'Round')] p139: connectstyle=Relief reliefconductorwidth=19.68 reliefentries=4 polygonreliefangle="90 Angle" airgapwidth=19.68
PolygonConnect Polygon_In3.Cu-_ConnectDirect [IsNamedPolygon('In3.Cu-') vs IsVia or IsSMTPin] p140: connectstyle=Direct reliefconductorwidth=10 reliefentries=4 polygonreliefangle="90 Angle" airgapwidth=10
PolygonConnect Polygon_In3.Cu-_ConnectRelief45 [IsNamedPolygon('In3.Cu-') vs IsThruPin and (PadShape_AllLayers = 'Round')] p141: connectstyle=Relief reliefconductorwidth=19.68 reliefentries=4 polygonreliefangle="90 Angle" airgapwidth=19.68
PolygonConnect Polygon_In3.Cu-_ConnectRelief90 [IsNamedPolygon('In3.Cu-') vs IsThruPin and (PadShape_AllLayers <> 'Round')] p142: connectstyle=Relief reliefconductorwidth=19.68 reliefentries=4 polygonreliefangle="90 Angle" airgapwidth=19.68
PolygonConnect Polygon_In1.Cu-_ConnectDirect [IsNamedPolygon('In1.Cu-') vs IsVia or IsSMTPin] p143: connectstyle=Direct reliefconductorwidth=10 reliefentries=4 polygonreliefangle="90 Angle" airgapwidth=10
PolygonConnect Polygon_In1.Cu-_ConnectRelief45 [IsNamedPolygon('In1.Cu-') vs IsThruPin and (PadShape_AllLayers = 'Round')] p144: connectstyle=Relief reliefconductorwidth=19.68 reliefentries=4 polygonreliefangle="90 Angle" airgapwidth=19.68
PolygonConnect Polygon_In1.Cu-_ConnectRelief90 [IsNamedPolygon('In1.Cu-') vs IsThruPin and (PadShape_AllLayers <> 'Round')] p145: connectstyle=Relief reliefconductorwidth=19.68 reliefentries=4 polygonreliefangle="90 Angle" airgapwidth=19.68
PolygonConnect Polygon_B.Cu-_ConnectDirect [IsNamedPolygon('B.Cu-') vs IsVia or IsSMTPin] p146: connectstyle=Direct reliefconductorwidth=10 reliefentries=4 polygonreliefangle="90 Angle" airgapwidth=10
PolygonConnect Polygon_B.Cu-_ConnectRelief45 [IsNamedPolygon('B.Cu-') vs IsThruPin and (PadShape_AllLayers = 'Round')] p147: connectstyle=Relief reliefconductorwidth=19.68 reliefentries=4 polygonreliefangle="90 Angle" airgapwidth=19.68
PolygonConnect Polygon_B.Cu-_ConnectRelief90 [IsNamedPolygon('B.Cu-') vs IsThruPin and (PadShape_AllLayers <> 'Round')] p148: connectstyle=Relief reliefconductorwidth=19.68 reliefentries=4 polygonreliefangle="90 Angle" airgapwidth=19.68
PolygonConnect Polygon_F.Cu--71_ConnectDirect [IsNamedPolygon('F.Cu--71') vs IsVia or IsSMTPin] p149: connectstyle=Direct reliefconductorwidth=10 reliefentries=4 polygonreliefangle="90 Angle" airgapwidth=10
PolygonConnect Polygon_F.Cu--71_ConnectRelief45 [IsNamedPolygon('F.Cu--71') vs IsThruPin and (PadShape_AllLayers = 'Round')] p150: connectstyle=Relief reliefconductorwidth=19.68 reliefentries=4 polygonreliefangle="90 Angle" airgapwidth=19.68
PolygonConnect Polygon_F.Cu--71_ConnectRelief90 [IsNamedPolygon('F.Cu--71') vs IsThruPin and (PadShape_AllLayers <> 'Round')] p151: connectstyle=Relief reliefconductorwidth=19.68 reliefentries=4 polygonreliefangle="90 Angle" airgapwidth=19.68
PolygonConnect Polygon_F.Cu--70_ConnectDirect [IsNamedPolygon('F.Cu--70')] p152: connectstyle=Direct reliefconductorwidth=10 reliefentries=4 polygonreliefangle="90 Angle" airgapwidth=10
PolygonConnect Polygon_F.Cu--69_ConnectDirect [IsNamedPolygon('F.Cu--69')] p153: connectstyle=Direct reliefconductorwidth=10 reliefentries=4 polygonreliefangle="90 Angle" airgapwidth=10
PolygonConnect Polygon_F.Cu--68_ConnectDirect [IsNamedPolygon('F.Cu--68')] p154: connectstyle=Direct reliefconductorwidth=10 reliefentries=4 polygonreliefangle="90 Angle" airgapwidth=10
PolygonConnect Polygon_F.Cu--67_ConnectDirect [IsNamedPolygon('F.Cu--67')] p155: connectstyle=Direct reliefconductorwidth=10 reliefentries=4 polygonreliefangle="90 Angle" airgapwidth=10
PolygonConnect Polygon_F.Cu--66_ConnectDirect [IsNamedPolygon('F.Cu--66')] p156: connectstyle=Direct reliefconductorwidth=10 reliefentries=4 polygonreliefangle="90 Angle" airgapwidth=10
PolygonConnect Polygon_F.Cu--65_ConnectDirect [IsNamedPolygon('F.Cu--65')] p157: connectstyle=Direct reliefconductorwidth=10 reliefentries=4 polygonreliefangle="90 Angle" airgapwidth=10
PolygonConnect Polygon_F.Cu--64_ConnectDirect [IsNamedPolygon('F.Cu--64')] p158: connectstyle=Direct reliefconductorwidth=10 reliefentries=4 polygonreliefangle="90 Angle" airgapwidth=10
PolygonConnect Polygon_F.Cu--63_ConnectDirect [IsNamedPolygon('F.Cu--63')] p159: connectstyle=Direct reliefconductorwidth=10 reliefentries=4 polygonreliefangle="90 Angle" airgapwidth=10
PolygonConnect Polygon_F.Cu--62_ConnectDirect [IsNamedPolygon('F.Cu--62')] p160: connectstyle=Direct reliefconductorwidth=10 reliefentries=4 polygonreliefangle="90 Angle" airgapwidth=10
PolygonConnect Polygon_F.Cu--61_ConnectDirect [IsNamedPolygon('F.Cu--61')] p161: connectstyle=Direct reliefconductorwidth=10 reliefentries=4 polygonreliefangle="90 Angle" airgapwidth=10
PolygonConnect Polygon_F.Cu--60_ConnectDirect [IsNamedPolygon('F.Cu--60')] p162: connectstyle=Direct reliefconductorwidth=10 reliefentries=4 polygonreliefangle="90 Angle" airgapwidth=10
PolygonConnect Polygon_F.Cu--59_ConnectDirect [IsNamedPolygon('F.Cu--59')] p163: connectstyle=Direct reliefconductorwidth=10 reliefentries=4 polygonreliefangle="90 Angle" airgapwidth=10
PolygonConnect Polygon_F.Cu--58_ConnectDirect [IsNamedPolygon('F.Cu--58')] p164: connectstyle=Direct reliefconductorwidth=10 reliefentries=4 polygonreliefangle="90 Angle" airgapwidth=10
PolygonConnect Polygon_F.Cu--57_ConnectDirect [IsNamedPolygon('F.Cu--57')] p165: connectstyle=Direct reliefconductorwidth=10 reliefentries=4 polygonreliefangle="90 Angle" airgapwidth=10
PolygonConnect Polygon_F.Cu--56_ConnectDirect [IsNamedPolygon('F.Cu--56')] p166: connectstyle=Direct reliefconductorwidth=10 reliefentries=4 polygonreliefangle="90 Angle" airgapwidth=10
PolygonConnect Polygon_F.Cu--55_ConnectDirect [IsNamedPolygon('F.Cu--55')] p167: connectstyle=Direct reliefconductorwidth=10 reliefentries=4 polygonreliefangle="90 Angle" airgapwidth=10
PolygonConnect Polygon_F.Cu--54_ConnectDirect [IsNamedPolygon('F.Cu--54')] p168: connectstyle=Direct reliefconductorwidth=10 reliefentries=4 polygonreliefangle="90 Angle" airgapwidth=10
PolygonConnect Polygon_F.Cu--53_ConnectDirect [IsNamedPolygon('F.Cu--53')] p169: connectstyle=Direct reliefconductorwidth=10 reliefentries=4 polygonreliefangle="90 Angle" airgapwidth=10
PolygonConnect Polygon_F.Cu--52_ConnectDirect [IsNamedPolygon('F.Cu--52')] p170: connectstyle=Direct reliefconductorwidth=10 reliefentries=4 polygonreliefangle="90 Angle" airgapwidth=10
PolygonConnect Polygon_F.Cu--51_ConnectDirect [IsNamedPolygon('F.Cu--51')] p171: connectstyle=Direct reliefconductorwidth=10 reliefentries=4 polygonreliefangle="90 Angle" airgapwidth=10
PolygonConnect Polygon_F.Cu--50_ConnectDirect [IsNamedPolygon('F.Cu--50')] p172: connectstyle=Direct reliefconductorwidth=10 reliefentries=4 polygonreliefangle="90 Angle" airgapwidth=10
PolygonConnect Polygon_F.Cu--49_ConnectDirect [IsNamedPolygon('F.Cu--49')] p173: connectstyle=Direct reliefconductorwidth=10 reliefentries=4 polygonreliefangle="90 Angle" airgapwidth=10
PolygonConnect Polygon_F.Cu--48_ConnectDirect [IsNamedPolygon('F.Cu--48')] p174: connectstyle=Direct reliefconductorwidth=10 reliefentries=4 polygonreliefangle="90 Angle" airgapwidth=10
PolygonConnect Polygon_F.Cu--47_ConnectDirect [IsNamedPolygon('F.Cu--47')] p175: connectstyle=Direct reliefconductorwidth=10 reliefentries=4 polygonreliefangle="90 Angle" airgapwidth=10
PolygonConnect Polygon_F.Cu--46_ConnectDirect [IsNamedPolygon('F.Cu--46')] p176: connectstyle=Direct reliefconductorwidth=10 reliefentries=4 polygonreliefangle="90 Angle" airgapwidth=10
PolygonConnect Polygon_F.Cu--45_ConnectDirect [IsNamedPolygon('F.Cu--45')] p177: connectstyle=Direct reliefconductorwidth=10 reliefentries=4 polygonreliefangle="90 Angle" airgapwidth=10
PolygonConnect Polygon_F.Cu--44_ConnectDirect [IsNamedPolygon('F.Cu--44')] p178: connectstyle=Direct reliefconductorwidth=10 reliefentries=4 polygonreliefangle="90 Angle" airgapwidth=10
PolygonConnect Polygon_F.Cu--43_ConnectDirect [IsNamedPolygon('F.Cu--43')] p179: connectstyle=Direct reliefconductorwidth=10 reliefentries=4 polygonreliefangle="90 Angle" airgapwidth=10
PolygonConnect Polygon_F.Cu--42_ConnectDirect [IsNamedPolygon('F.Cu--42')] p180: connectstyle=Direct reliefconductorwidth=10 reliefentries=4 polygonreliefangle="90 Angle" airgapwidth=10
PolygonConnect Polygon_F.Cu--41_ConnectDirect [IsNamedPolygon('F.Cu--41')] p181: connectstyle=Direct reliefconductorwidth=10 reliefentries=4 polygonreliefangle="90 Angle" airgapwidth=10
PolygonConnect Polygon_F.Cu--40_ConnectDirect [IsNamedPolygon('F.Cu--40')] p182: connectstyle=Direct reliefconductorwidth=10 reliefentries=4 polygonreliefangle="90 Angle" airgapwidth=10
PolygonConnect Polygon_F.Cu--39_ConnectDirect [IsNamedPolygon('F.Cu--39')] p183: connectstyle=Direct reliefconductorwidth=10 reliefentries=4 polygonreliefangle="90 Angle" airgapwidth=10
PolygonConnect Polygon_F.Cu--38_ConnectDirect [IsNamedPolygon('F.Cu--38')] p184: connectstyle=Direct reliefconductorwidth=10 reliefentries=4 polygonreliefangle="90 Angle" airgapwidth=10
PolygonConnect Polygon_F.Cu--37_ConnectDirect [IsNamedPolygon('F.Cu--37')] p185: connectstyle=Direct reliefconductorwidth=10 reliefentries=4 polygonreliefangle="90 Angle" airgapwidth=10
PolygonConnect Polygon_F.Cu--36_ConnectDirect [IsNamedPolygon('F.Cu--36')] p186: connectstyle=Direct reliefconductorwidth=10 reliefentries=4 polygonreliefangle="90 Angle" airgapwidth=10
PolygonConnect Polygon_F.Cu--35_ConnectDirect [IsNamedPolygon('F.Cu--35')] p187: connectstyle=Direct reliefconductorwidth=10 reliefentries=4 polygonreliefangle="90 Angle" airgapwidth=10
PolygonConnect Polygon_F.Cu--34_ConnectDirect [IsNamedPolygon('F.Cu--34')] p188: connectstyle=Direct reliefconductorwidth=10 reliefentries=4 polygonreliefangle="90 Angle" airgapwidth=10
PolygonConnect Polygon_F.Cu--33_ConnectDirect [IsNamedPolygon('F.Cu--33')] p189: connectstyle=Direct reliefconductorwidth=10 reliefentries=4 polygonreliefangle="90 Angle" airgapwidth=10
PolygonConnect Polygon_F.Cu--32_ConnectDirect [IsNamedPolygon('F.Cu--32')] p190: connectstyle=Direct reliefconductorwidth=10 reliefentries=4 polygonreliefangle="90 Angle" airgapwidth=10
PolygonConnect Polygon_F.Cu--31_ConnectDirect [IsNamedPolygon('F.Cu--31')] p191: connectstyle=Direct reliefconductorwidth=10 reliefentries=4 polygonreliefangle="90 Angle" airgapwidth=10
PolygonConnect Polygon_F.Cu--30_ConnectDirect [IsNamedPolygon('F.Cu--30')] p192: connectstyle=Direct reliefconductorwidth=10 reliefentries=4 polygonreliefangle="90 Angle" airgapwidth=10
PolygonConnect Polygon_F.Cu--29_ConnectDirect [IsNamedPolygon('F.Cu--29')] p193: connectstyle=Direct reliefconductorwidth=10 reliefentries=4 polygonreliefangle="90 Angle" airgapwidth=10
PolygonConnect Polygon_F.Cu--28_ConnectDirect [IsNamedPolygon('F.Cu--28')] p194: connectstyle=Direct reliefconductorwidth=10 reliefentries=4 polygonreliefangle="90 Angle" airgapwidth=10
PolygonConnect Polygon_F.Cu--27_ConnectDirect [IsNamedPolygon('F.Cu--27')] p195: connectstyle=Direct reliefconductorwidth=10 reliefentries=4 polygonreliefangle="90 Angle" airgapwidth=10
PolygonConnect Polygon_F.Cu--26_ConnectDirect [IsNamedPolygon('F.Cu--26')] p196: connectstyle=Direct reliefconductorwidth=10 reliefentries=4 polygonreliefangle="90 Angle" airgapwidth=10
PolygonConnect Polygon_F.Cu--25_ConnectDirect [IsNamedPolygon('F.Cu--25')] p197: connectstyle=Direct reliefconductorwidth=10 reliefentries=4 polygonreliefangle="90 Angle" airgapwidth=10
PolygonConnect Polygon_F.Cu--24_ConnectDirect [IsNamedPolygon('F.Cu--24')] p198: connectstyle=Direct reliefconductorwidth=10 reliefentries=4 polygonreliefangle="90 Angle" airgapwidth=10
PolygonConnect Polygon_F.Cu--23_ConnectDirect [IsNamedPolygon('F.Cu--23')] p199: connectstyle=Direct reliefconductorwidth=10 reliefentries=4 polygonreliefangle="90 Angle" airgapwidth=10
PolygonConnect Polygon_F.Cu--22_ConnectDirect [IsNamedPolygon('F.Cu--22')] p200: connectstyle=Direct reliefconductorwidth=10 reliefentries=4 polygonreliefangle="90 Angle" airgapwidth=10
PolygonConnect Polygon_F.Cu--21_ConnectDirect [IsNamedPolygon('F.Cu--21')] p201: connectstyle=Direct reliefconductorwidth=10 reliefentries=4 polygonreliefangle="90 Angle" airgapwidth=10
PolygonConnect Polygon_F.Cu--20_ConnectDirect [IsNamedPolygon('F.Cu--20')] p202: connectstyle=Direct reliefconductorwidth=10 reliefentries=4 polygonreliefangle="90 Angle" airgapwidth=10
PolygonConnect Polygon_F.Cu--19_ConnectDirect [IsNamedPolygon('F.Cu--19')] p203: connectstyle=Direct reliefconductorwidth=10 reliefentries=4 polygonreliefangle="90 Angle" airgapwidth=10
PolygonConnect Polygon_F.Cu--18_ConnectDirect [IsNamedPolygon('F.Cu--18')] p204: connectstyle=Direct reliefconductorwidth=10 reliefentries=4 polygonreliefangle="90 Angle" airgapwidth=10
PolygonConnect Polygon_F.Cu--17_ConnectDirect [IsNamedPolygon('F.Cu--17')] p205: connectstyle=Direct reliefconductorwidth=10 reliefentries=4 polygonreliefangle="90 Angle" airgapwidth=10
PolygonConnect Polygon_F.Cu--16_ConnectDirect [IsNamedPolygon('F.Cu--16')] p206: connectstyle=Direct reliefconductorwidth=10 reliefentries=4 polygonreliefangle="90 Angle" airgapwidth=10
PolygonConnect Polygon_F.Cu--15_ConnectDirect [IsNamedPolygon('F.Cu--15')] p207: connectstyle=Direct reliefconductorwidth=10 reliefentries=4 polygonreliefangle="90 Angle" airgapwidth=10
PolygonConnect Polygon_F.Cu--14_ConnectDirect [IsNamedPolygon('F.Cu--14')] p208: connectstyle=Direct reliefconductorwidth=10 reliefentries=4 polygonreliefangle="90 Angle" airgapwidth=10
PolygonConnect Polygon_F.Cu--13_ConnectDirect [IsNamedPolygon('F.Cu--13')] p209: connectstyle=Direct reliefconductorwidth=10 reliefentries=4 polygonreliefangle="90 Angle" airgapwidth=10
PolygonConnect Polygon_F.Cu--12_ConnectDirect [IsNamedPolygon('F.Cu--12')] p210: connectstyle=Direct reliefconductorwidth=10 reliefentries=4 polygonreliefangle="90 Angle" airgapwidth=10
PolygonConnect Polygon_F.Cu--11_ConnectDirect [IsNamedPolygon('F.Cu--11')] p211: connectstyle=Direct reliefconductorwidth=10 reliefentries=4 polygonreliefangle="90 Angle" airgapwidth=10
PolygonConnect Polygon_F.Cu--10_ConnectDirect [IsNamedPolygon('F.Cu--10')] p212: connectstyle=Direct reliefconductorwidth=10 reliefentries=4 polygonreliefangle="90 Angle" airgapwidth=10
PolygonConnect Polygon_F.Cu--9_ConnectDirect [IsNamedPolygon('F.Cu--9')] p213: connectstyle=Direct reliefconductorwidth=10 reliefentries=4 polygonreliefangle="90 Angle" airgapwidth=10
PolygonConnect Polygon_F.Cu--8_ConnectDirect [IsNamedPolygon('F.Cu--8')] p214: connectstyle=Direct reliefconductorwidth=10 reliefentries=4 polygonreliefangle="90 Angle" airgapwidth=10
PolygonConnect Polygon_F.Cu--7_ConnectDirect [IsNamedPolygon('F.Cu--7')] p215: connectstyle=Direct reliefconductorwidth=10 reliefentries=4 polygonreliefangle="90 Angle" airgapwidth=10
PolygonConnect Polygon_F.Cu--6_ConnectDirect [IsNamedPolygon('F.Cu--6')] p216: connectstyle=Direct reliefconductorwidth=10 reliefentries=4 polygonreliefangle="90 Angle" airgapwidth=10
PolygonConnect Polygon_F.Cu--5_ConnectDirect [IsNamedPolygon('F.Cu--5')] p217: connectstyle=Direct reliefconductorwidth=10 reliefentries=4 polygonreliefangle="90 Angle" airgapwidth=10
PolygonConnect Polygon_F.Cu--4_ConnectDirect [IsNamedPolygon('F.Cu--4')] p218: connectstyle=Direct reliefconductorwidth=10 reliefentries=4 polygonreliefangle="90 Angle" airgapwidth=10
PolygonConnect Polygon_F.Cu--3_ConnectDirect [IsNamedPolygon('F.Cu--3')] p219: connectstyle=Direct reliefconductorwidth=10 reliefentries=4 polygonreliefangle="90 Angle" airgapwidth=10
PolygonConnect Polygon_F.Cu--2_ConnectDirect [IsNamedPolygon('F.Cu--2')] p220: connectstyle=Direct reliefconductorwidth=10 reliefentries=4 polygonreliefangle="90 Angle" airgapwidth=10
PolygonConnect Polygon_F.Cu--1_ConnectDirect [IsNamedPolygon('F.Cu--1')] p221: connectstyle=Direct reliefconductorwidth=10 reliefentries=4 polygonreliefangle="90 Angle" airgapwidth=10
PolygonConnect Polygon_F.Cu-_ConnectDirect [IsNamedPolygon('F.Cu-')] p222: connectstyle=Direct reliefconductorwidth=10 reliefentries=4 polygonreliefangle="90 Angle" airgapwidth=10
RoutingVias [All] p1: holewidth=11.81 width=16 viastyle="Through Hole" minholewidth=11.81 minwidth=16 maxholewidth=11.81 maxwidth=16
SilkToSilkClearance [All] p1: silktosilkclearance=0
SilkToSolderMaskClearance [IsPad] p1: minsilkscreentomaskgap=0 clearancetoexposedcopper=TRUE